# Altium PCB ZYNQ_BOARD.PcbDoc (part 1 of 9)
Units mm, origin at the board's own origin, x right, y up, seen from the top; angles counter-clockwise.
Board outline 120 x 66 mm, 10 copper layers (Top Layer, Internal Plane 1 (GND), Middle Layer 1, Middle Layer 2, Internal Plane 2 (+1.0V), Middle Layer 3, Middle Layer 4, Middle Layer 5 (PWR), Internal Plane 3 (GND), Bottom Layer), stack 0.982 mm thick; 333 components, 331 nets, 1511 pads, 1077 vias.
Unrouted connection lines stored in the file: 30.
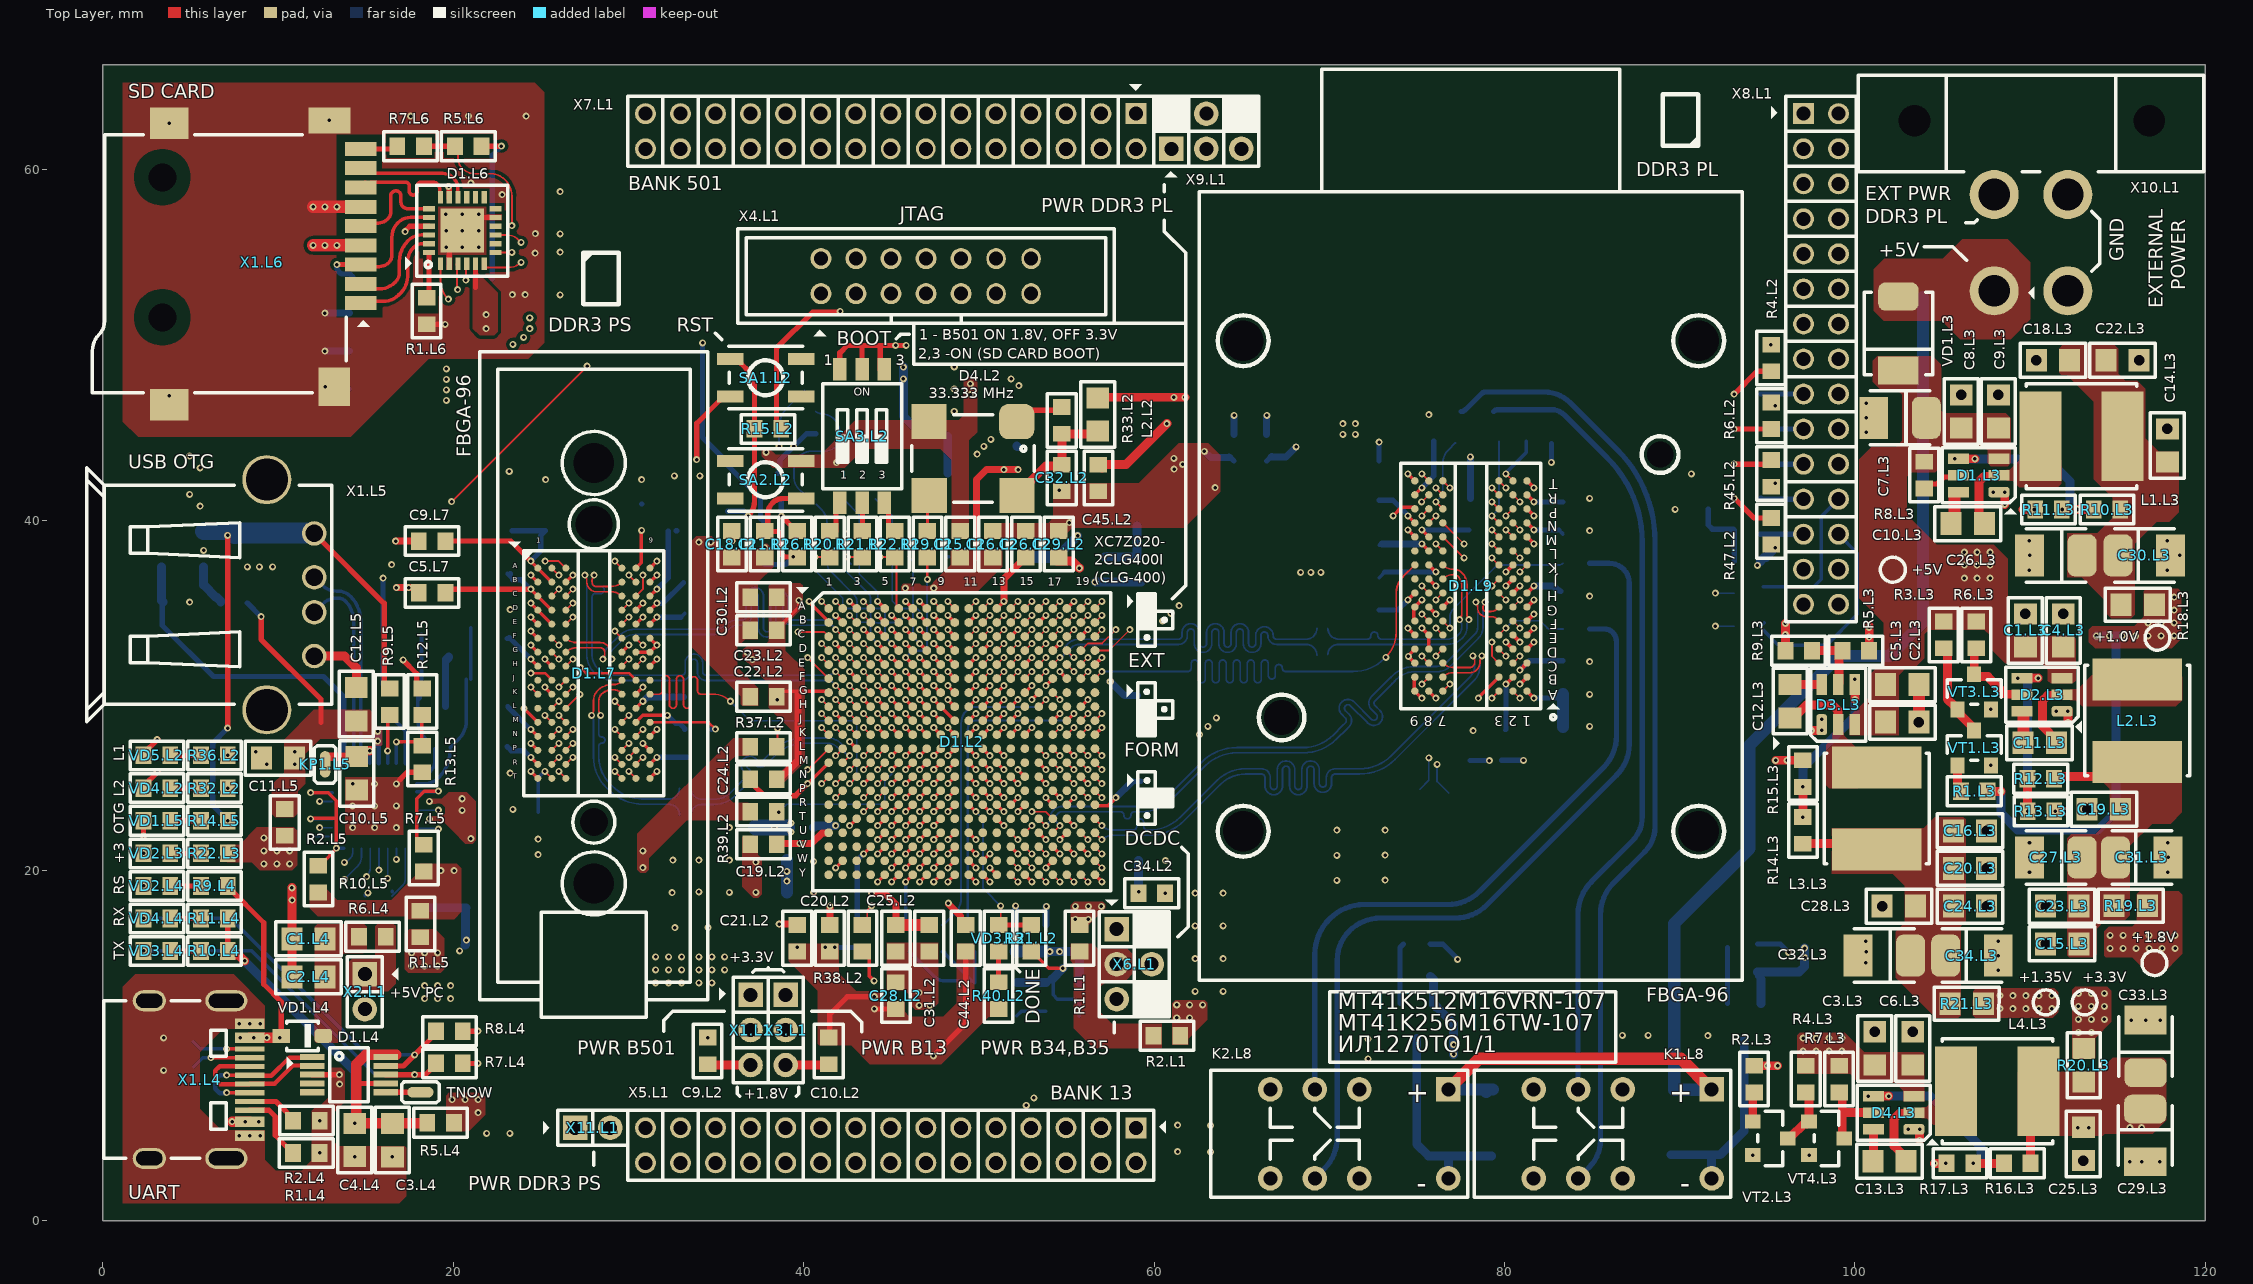
[diagram p0: Top Layer view]
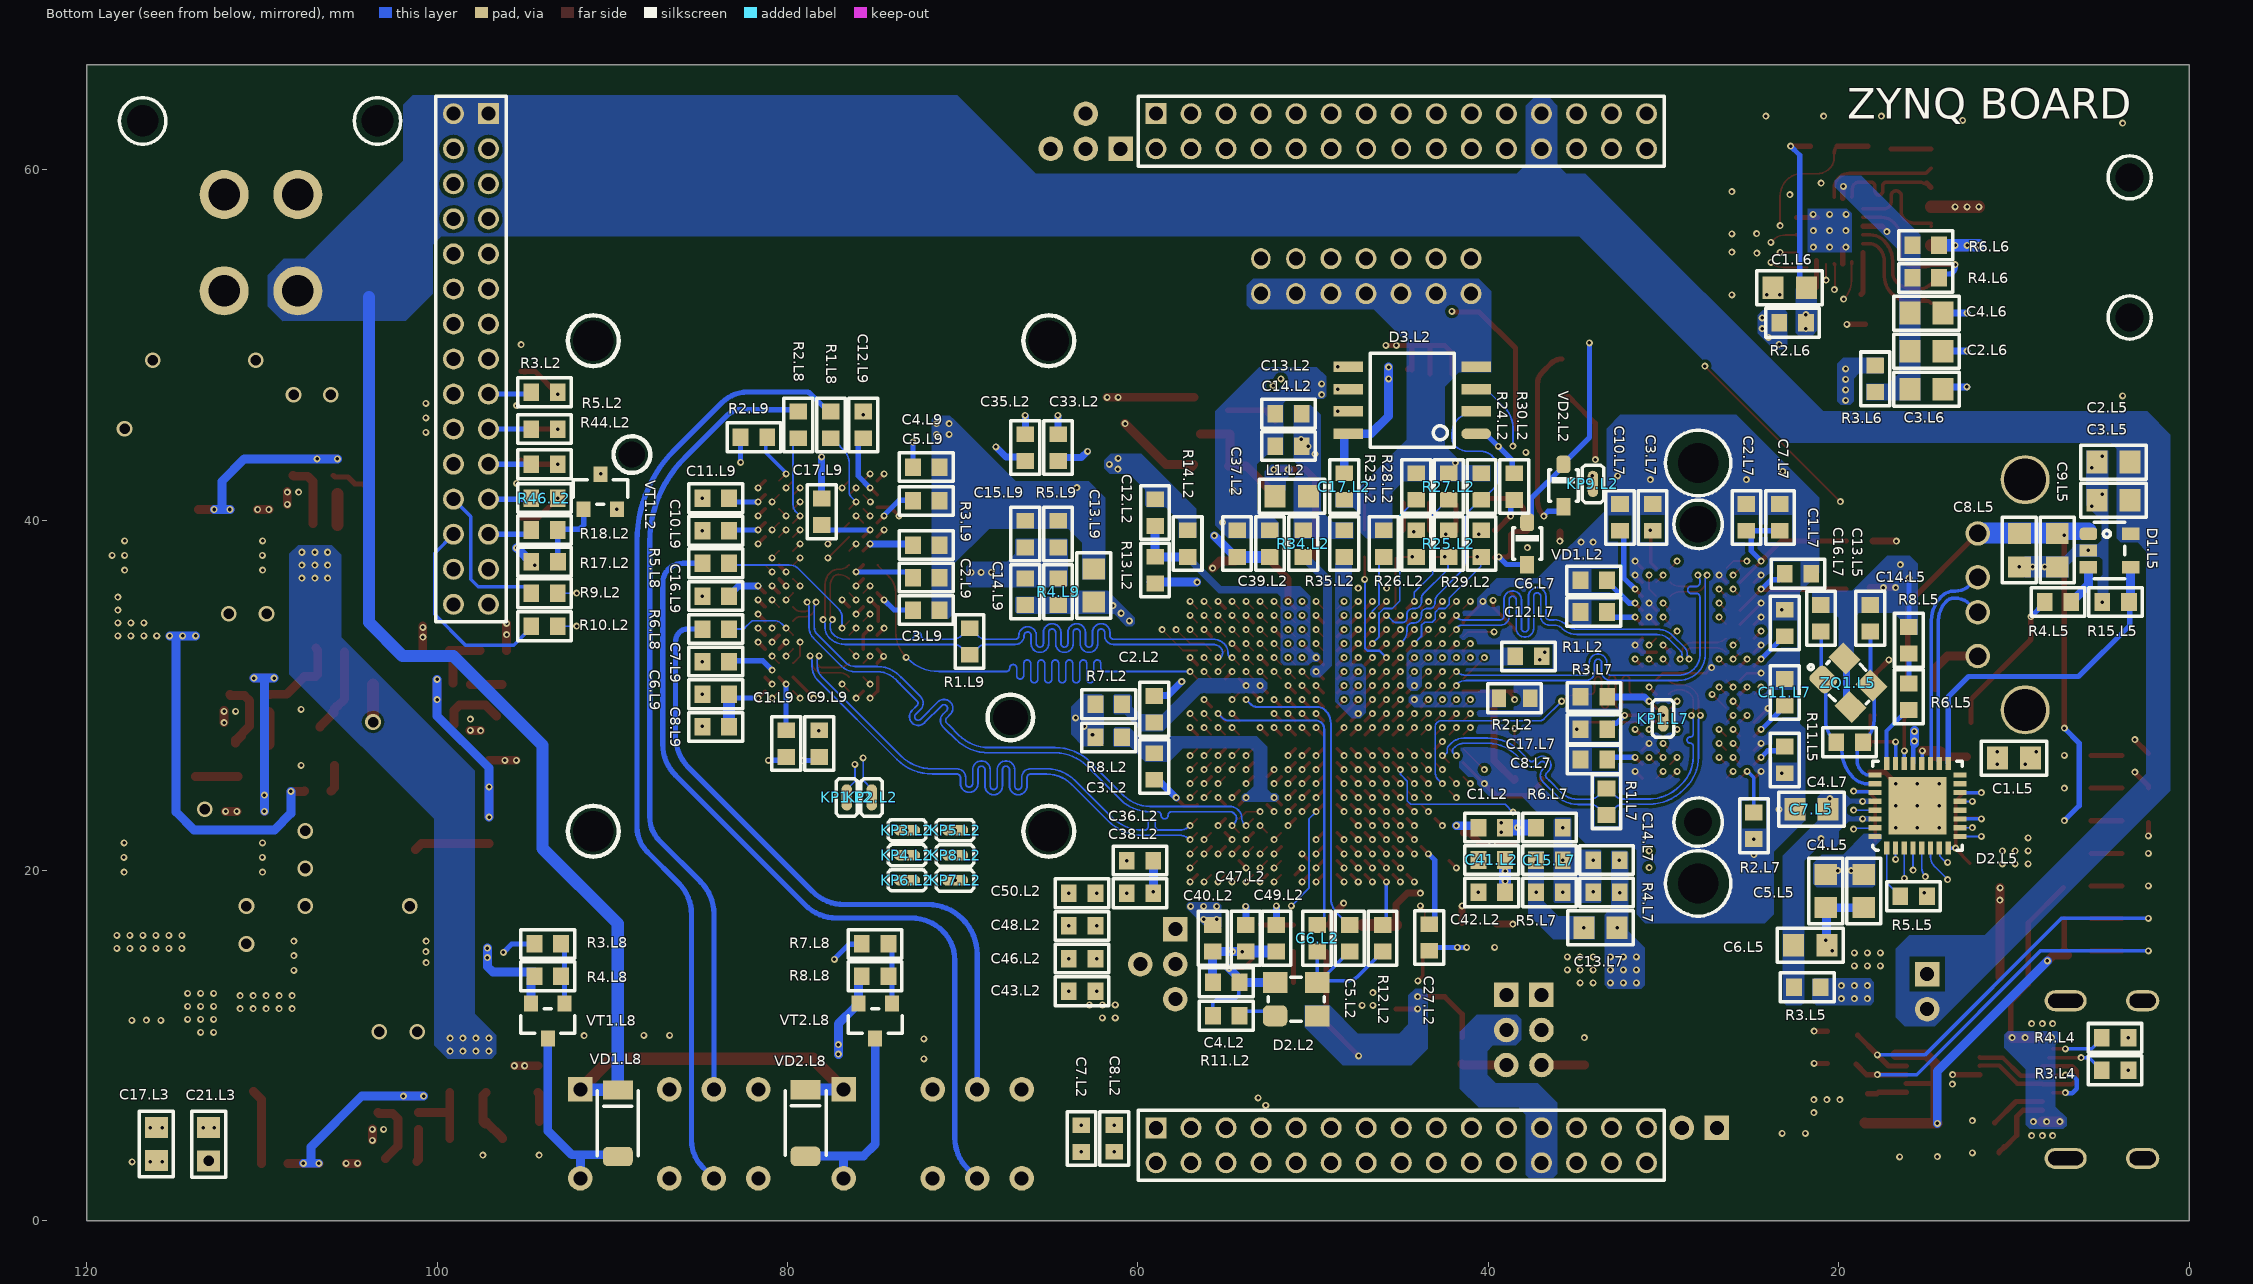
[diagram p1: Bottom Layer view, seen from below]
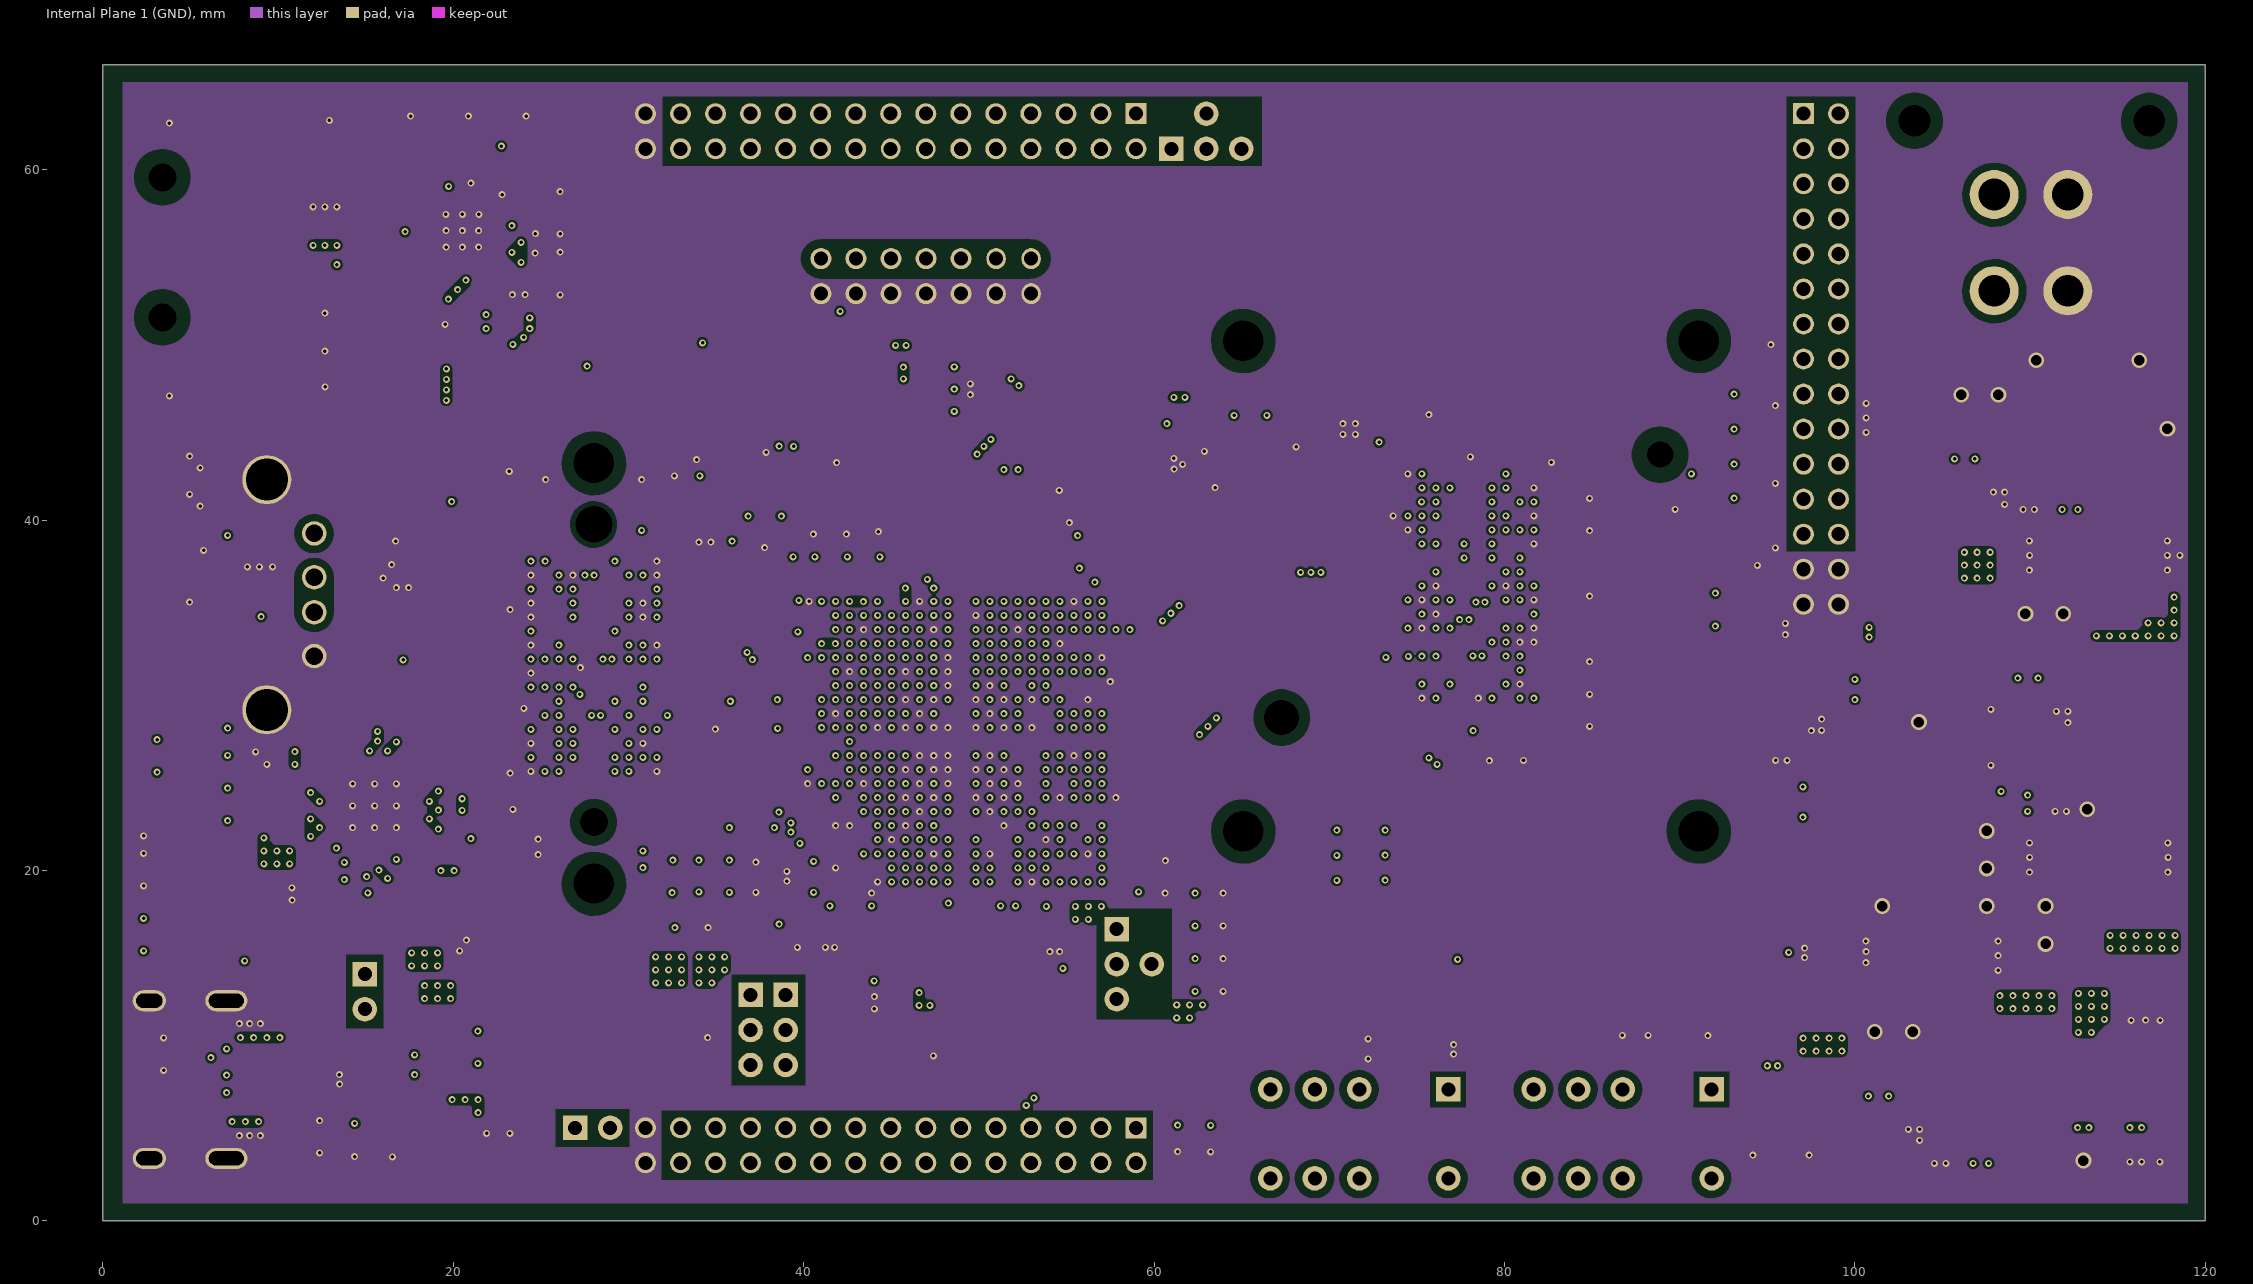
[diagram p2: Internal Plane 1 (GND)]
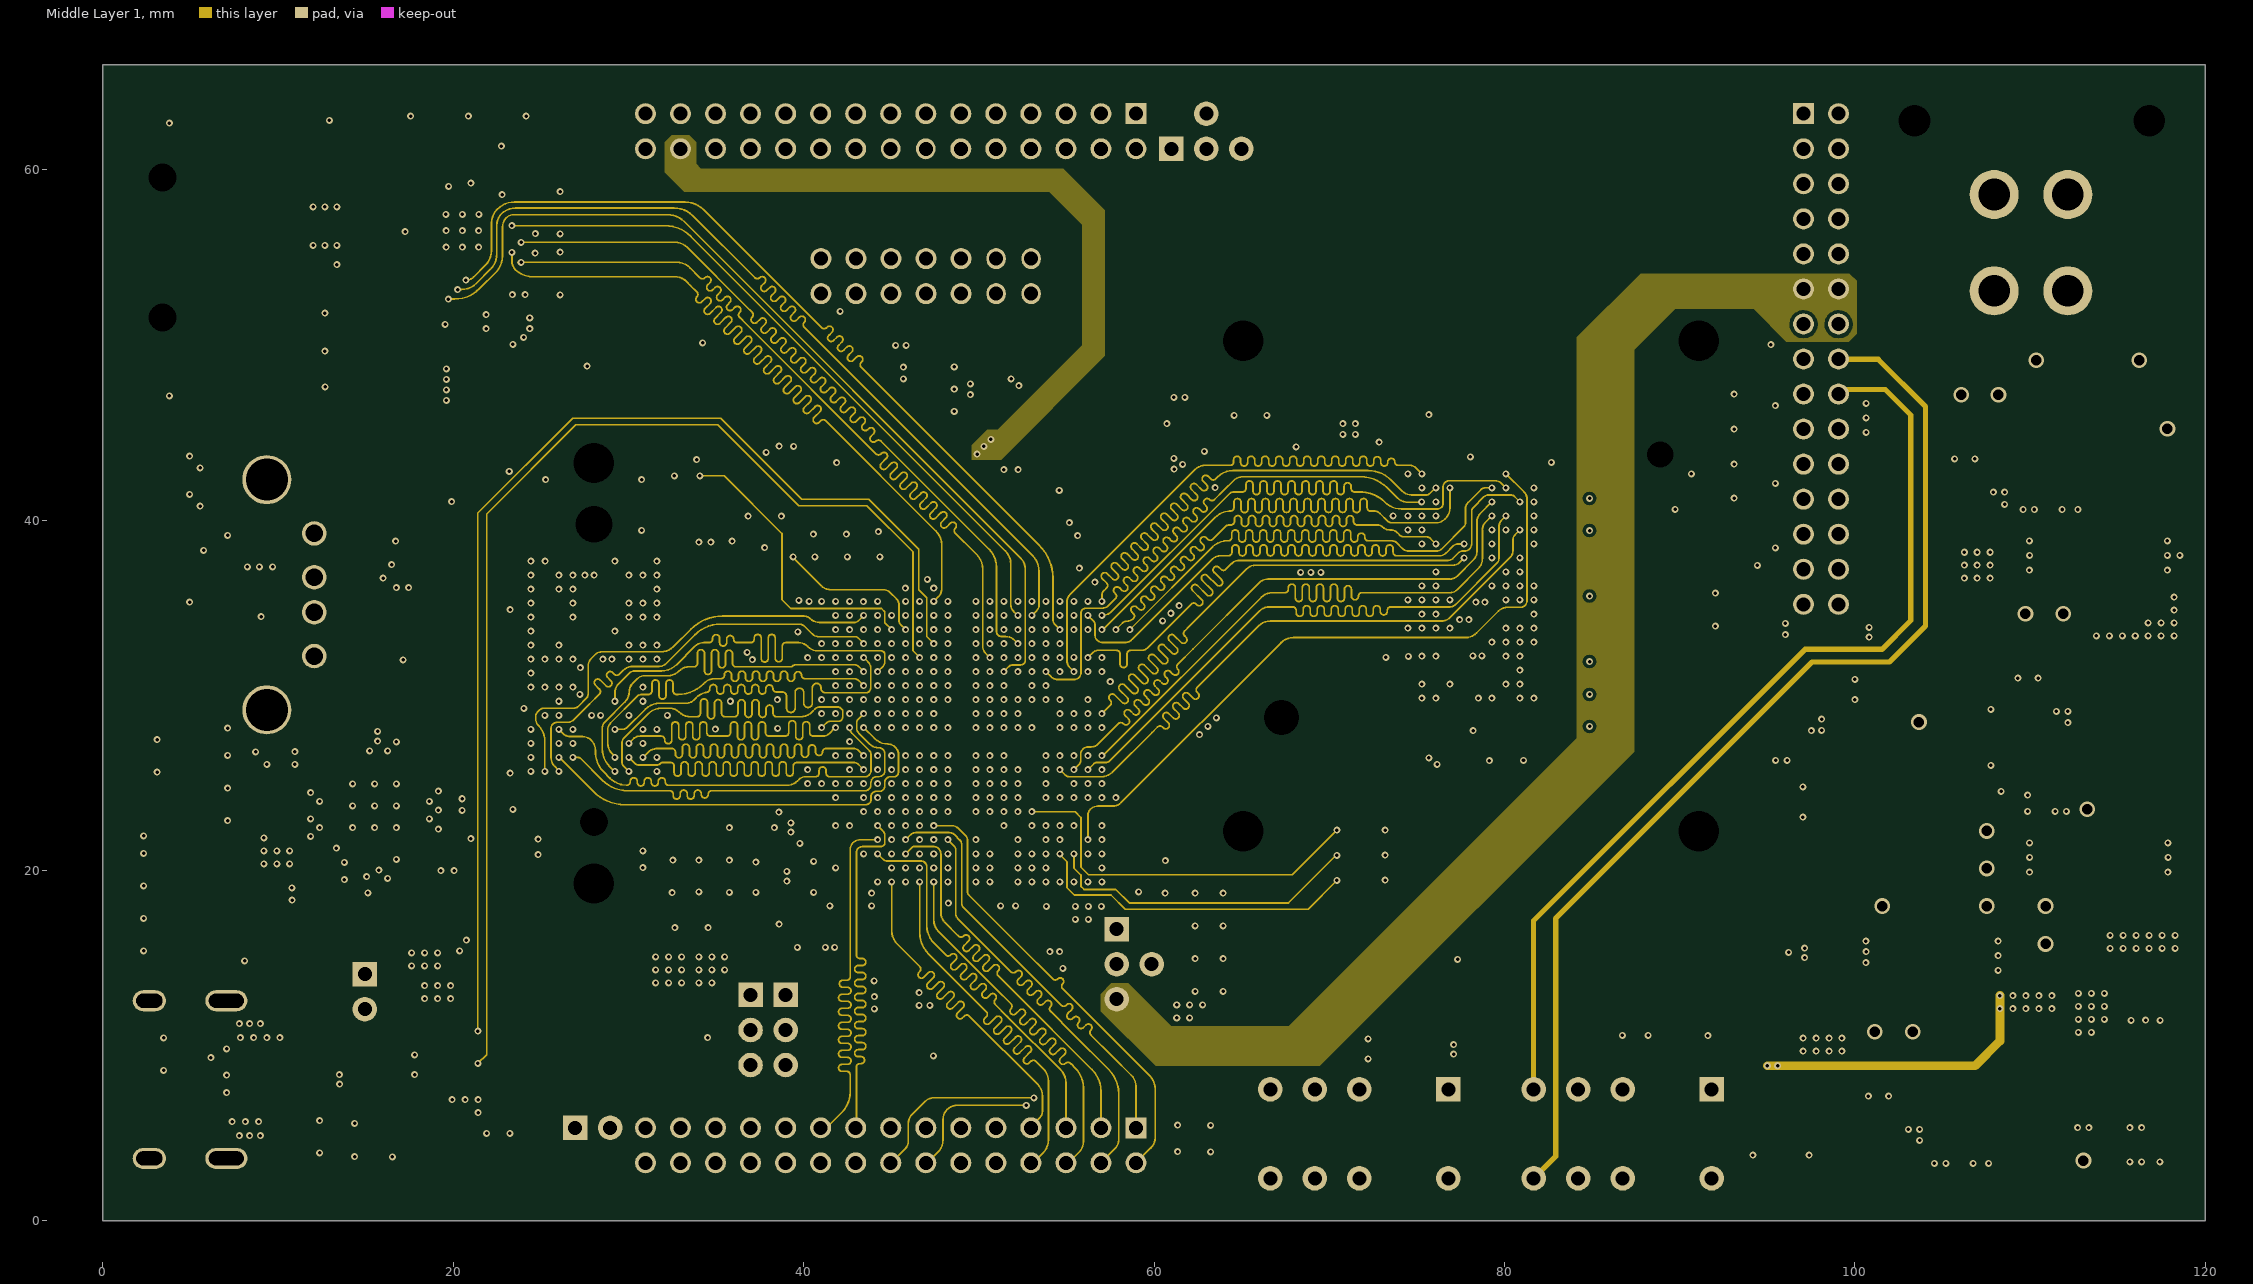
[diagram p3: Middle Layer 1]
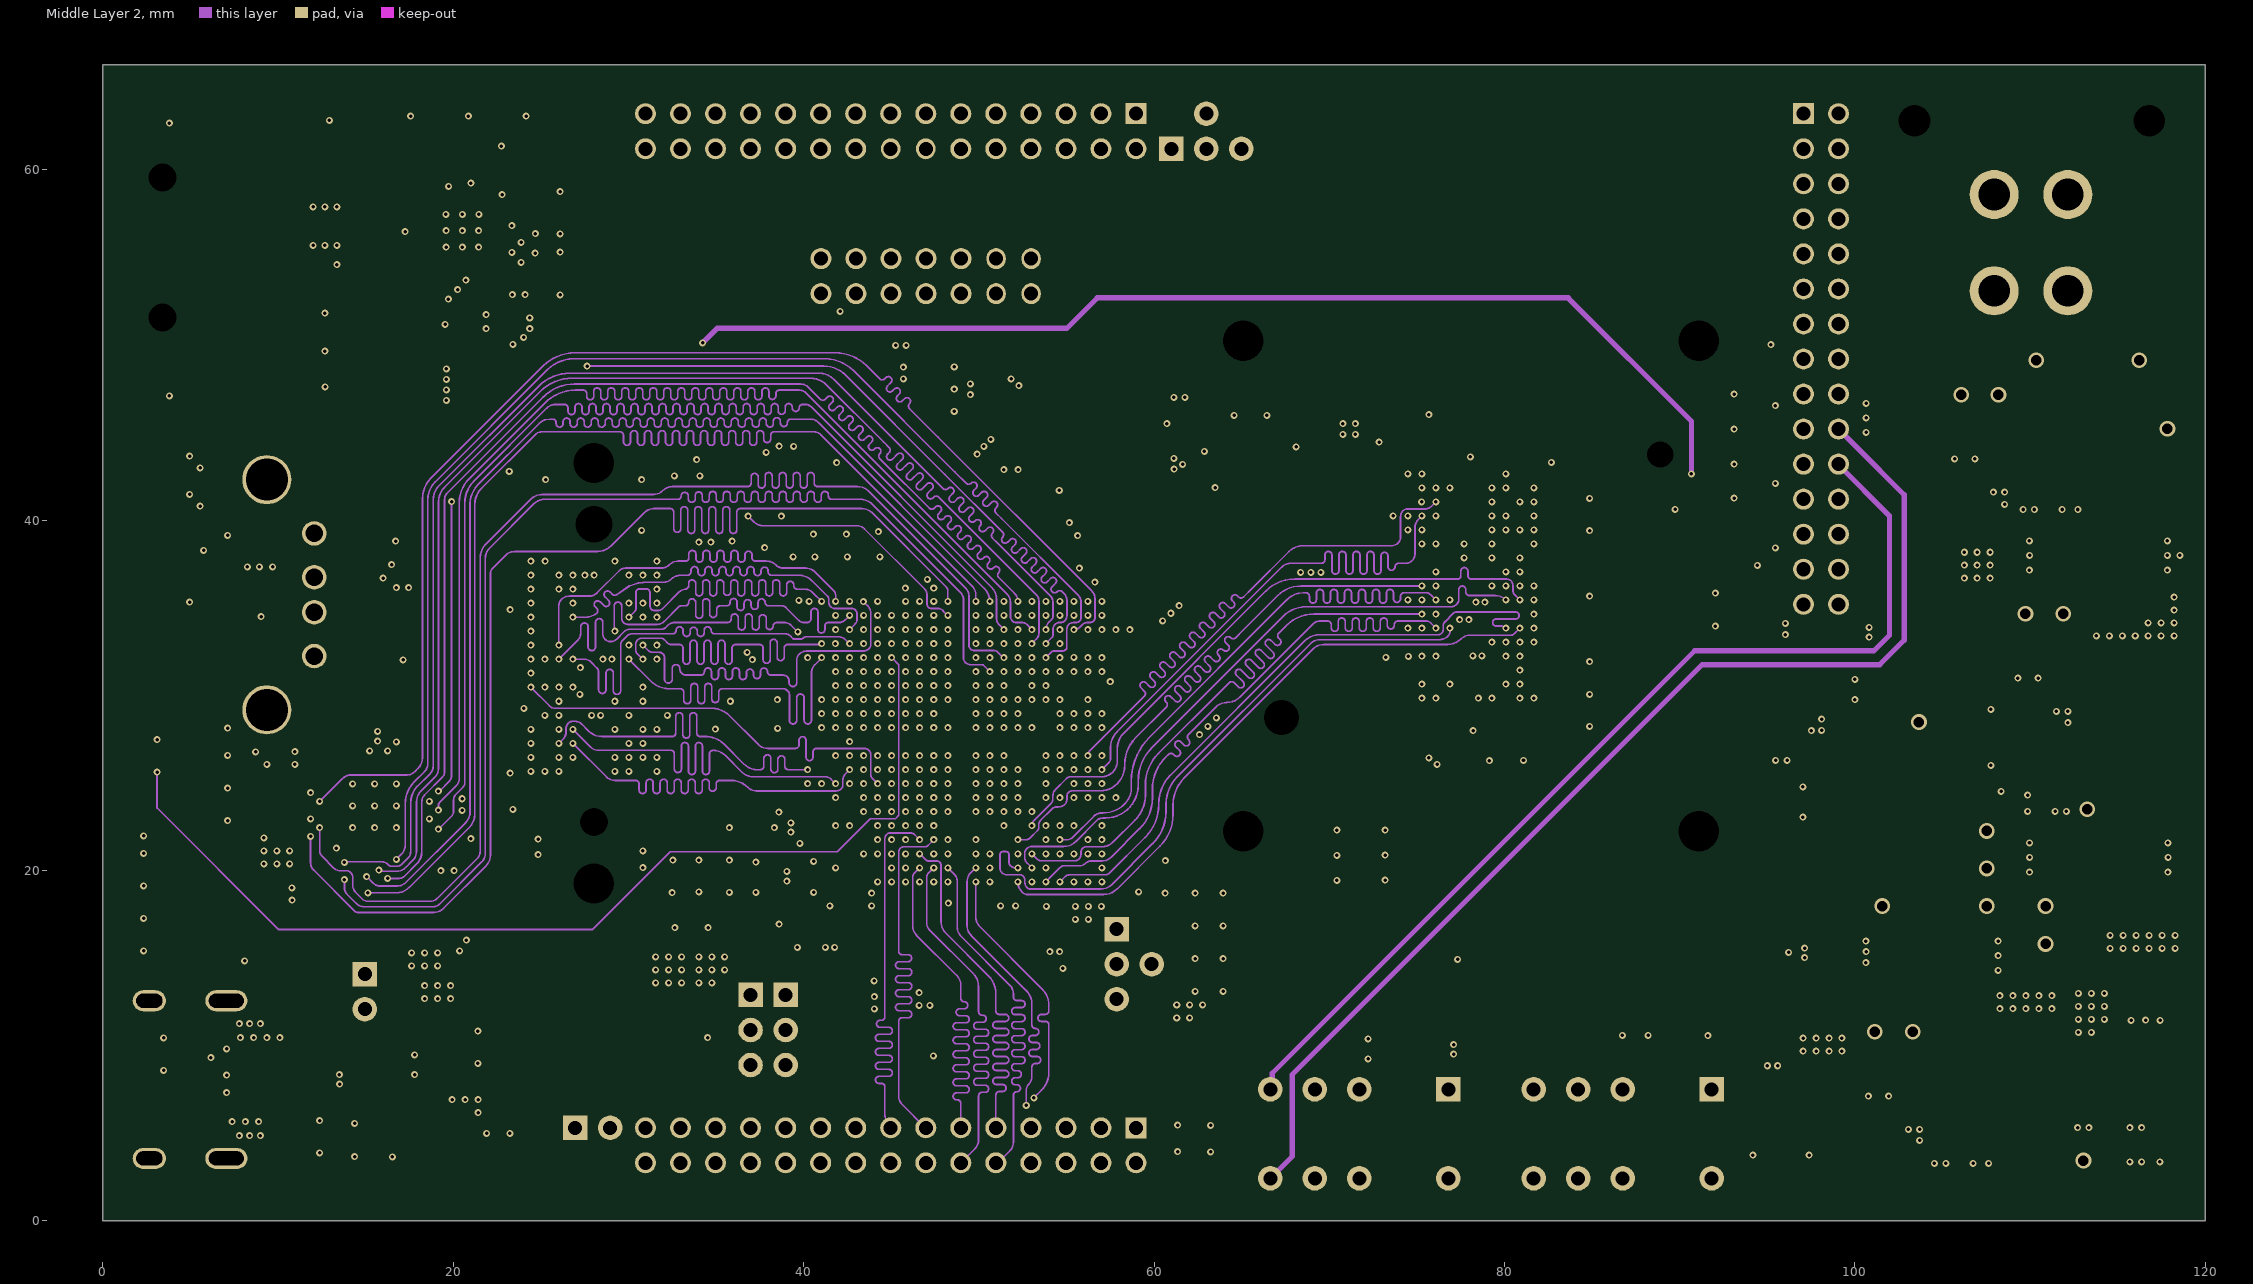
[diagram p4: Middle Layer 2]
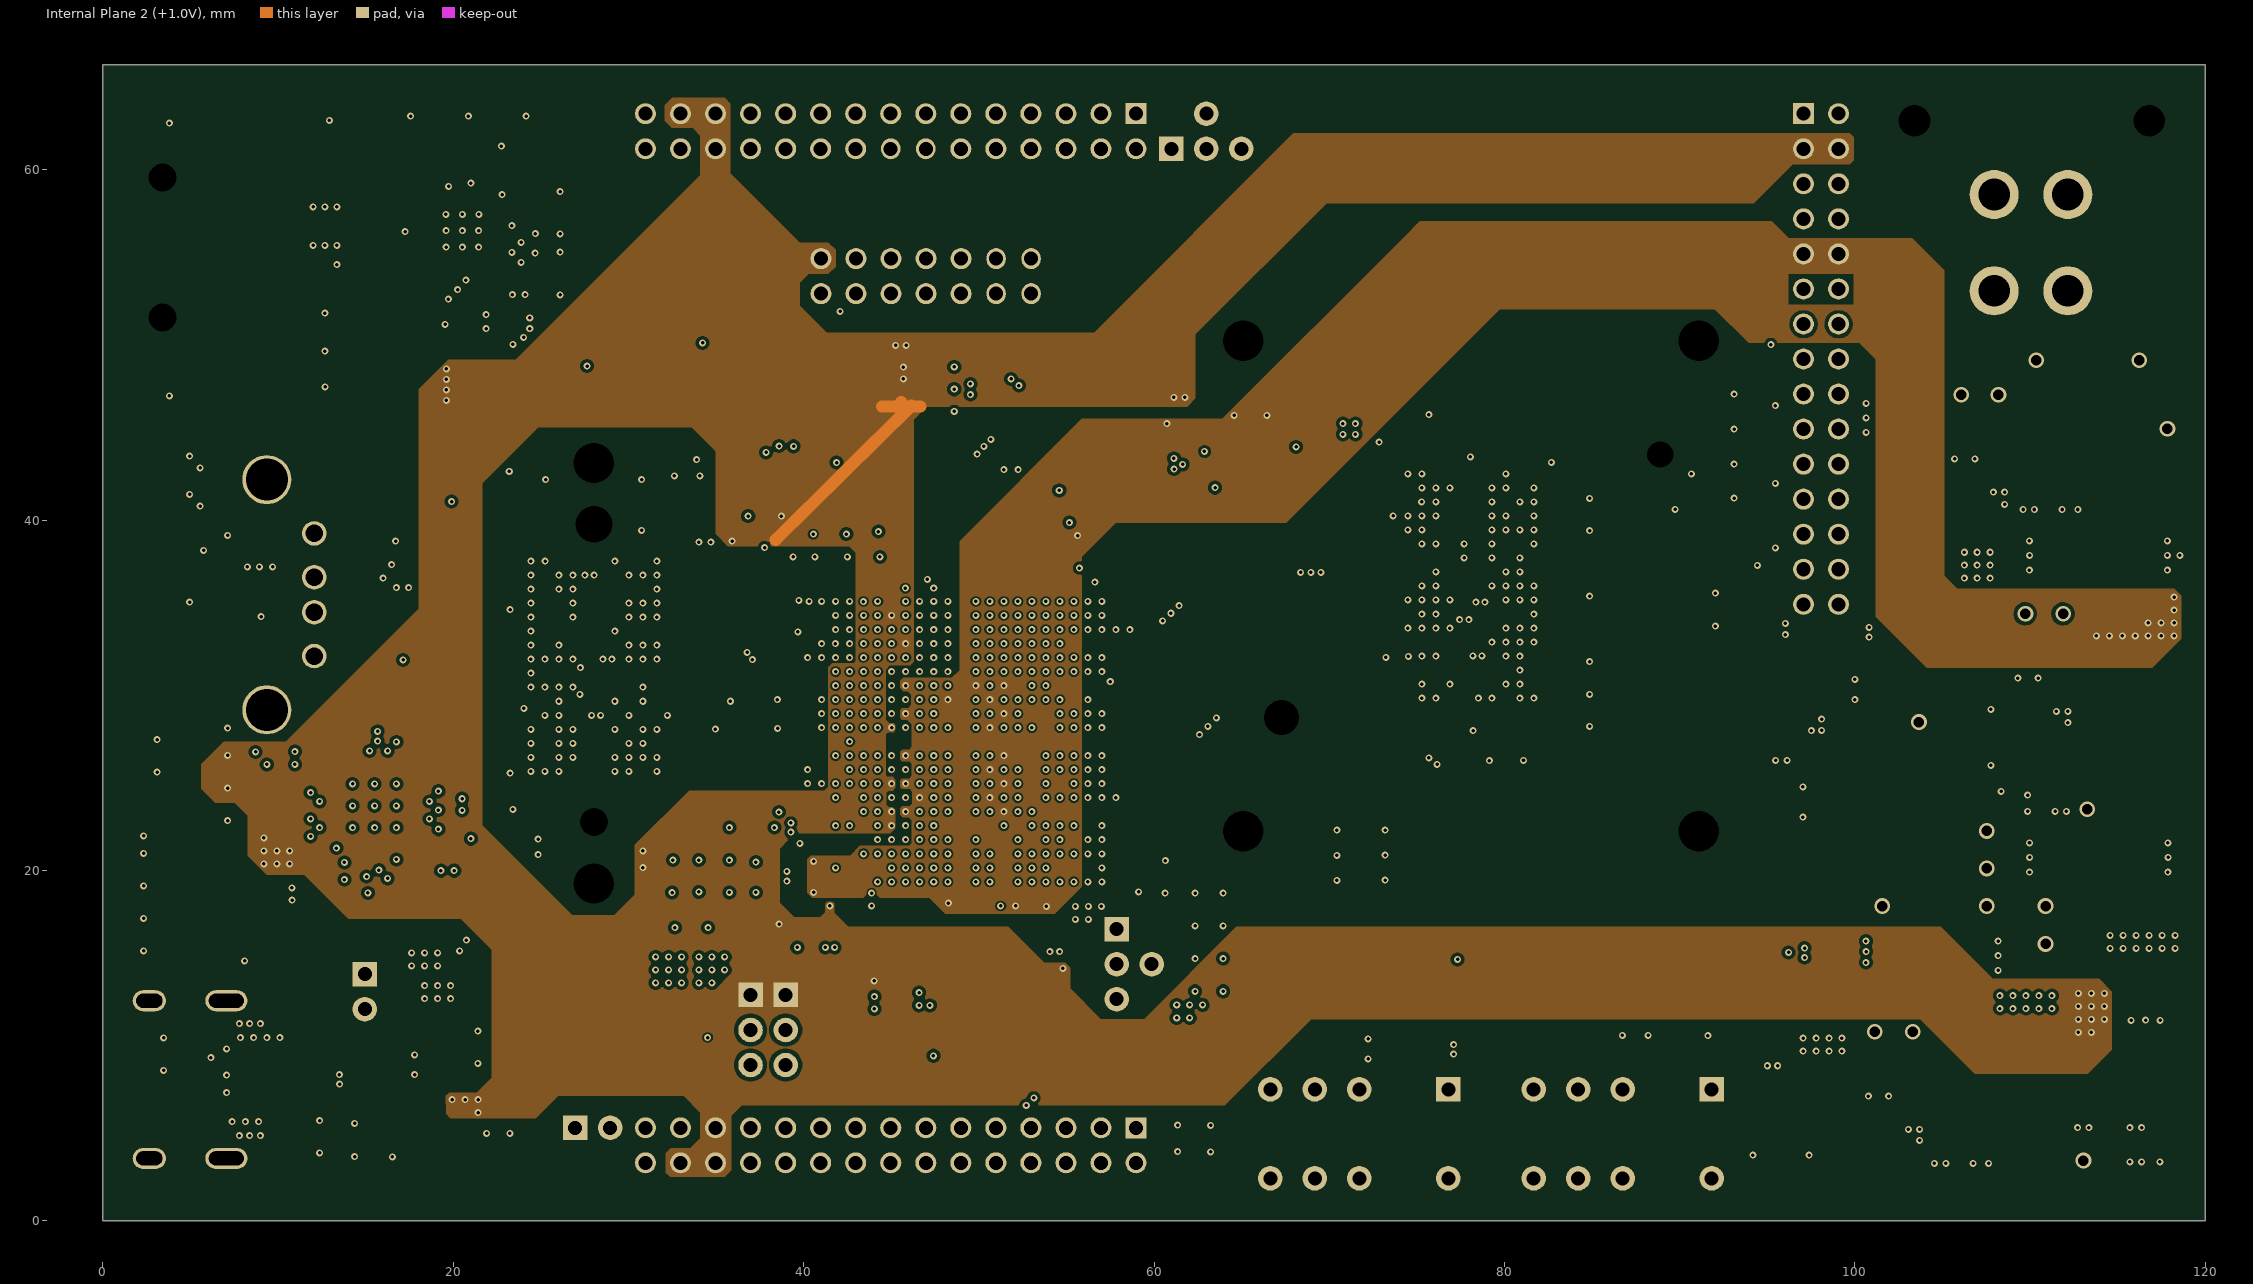
[diagram p5: Internal Plane 2 (+1.0V)]
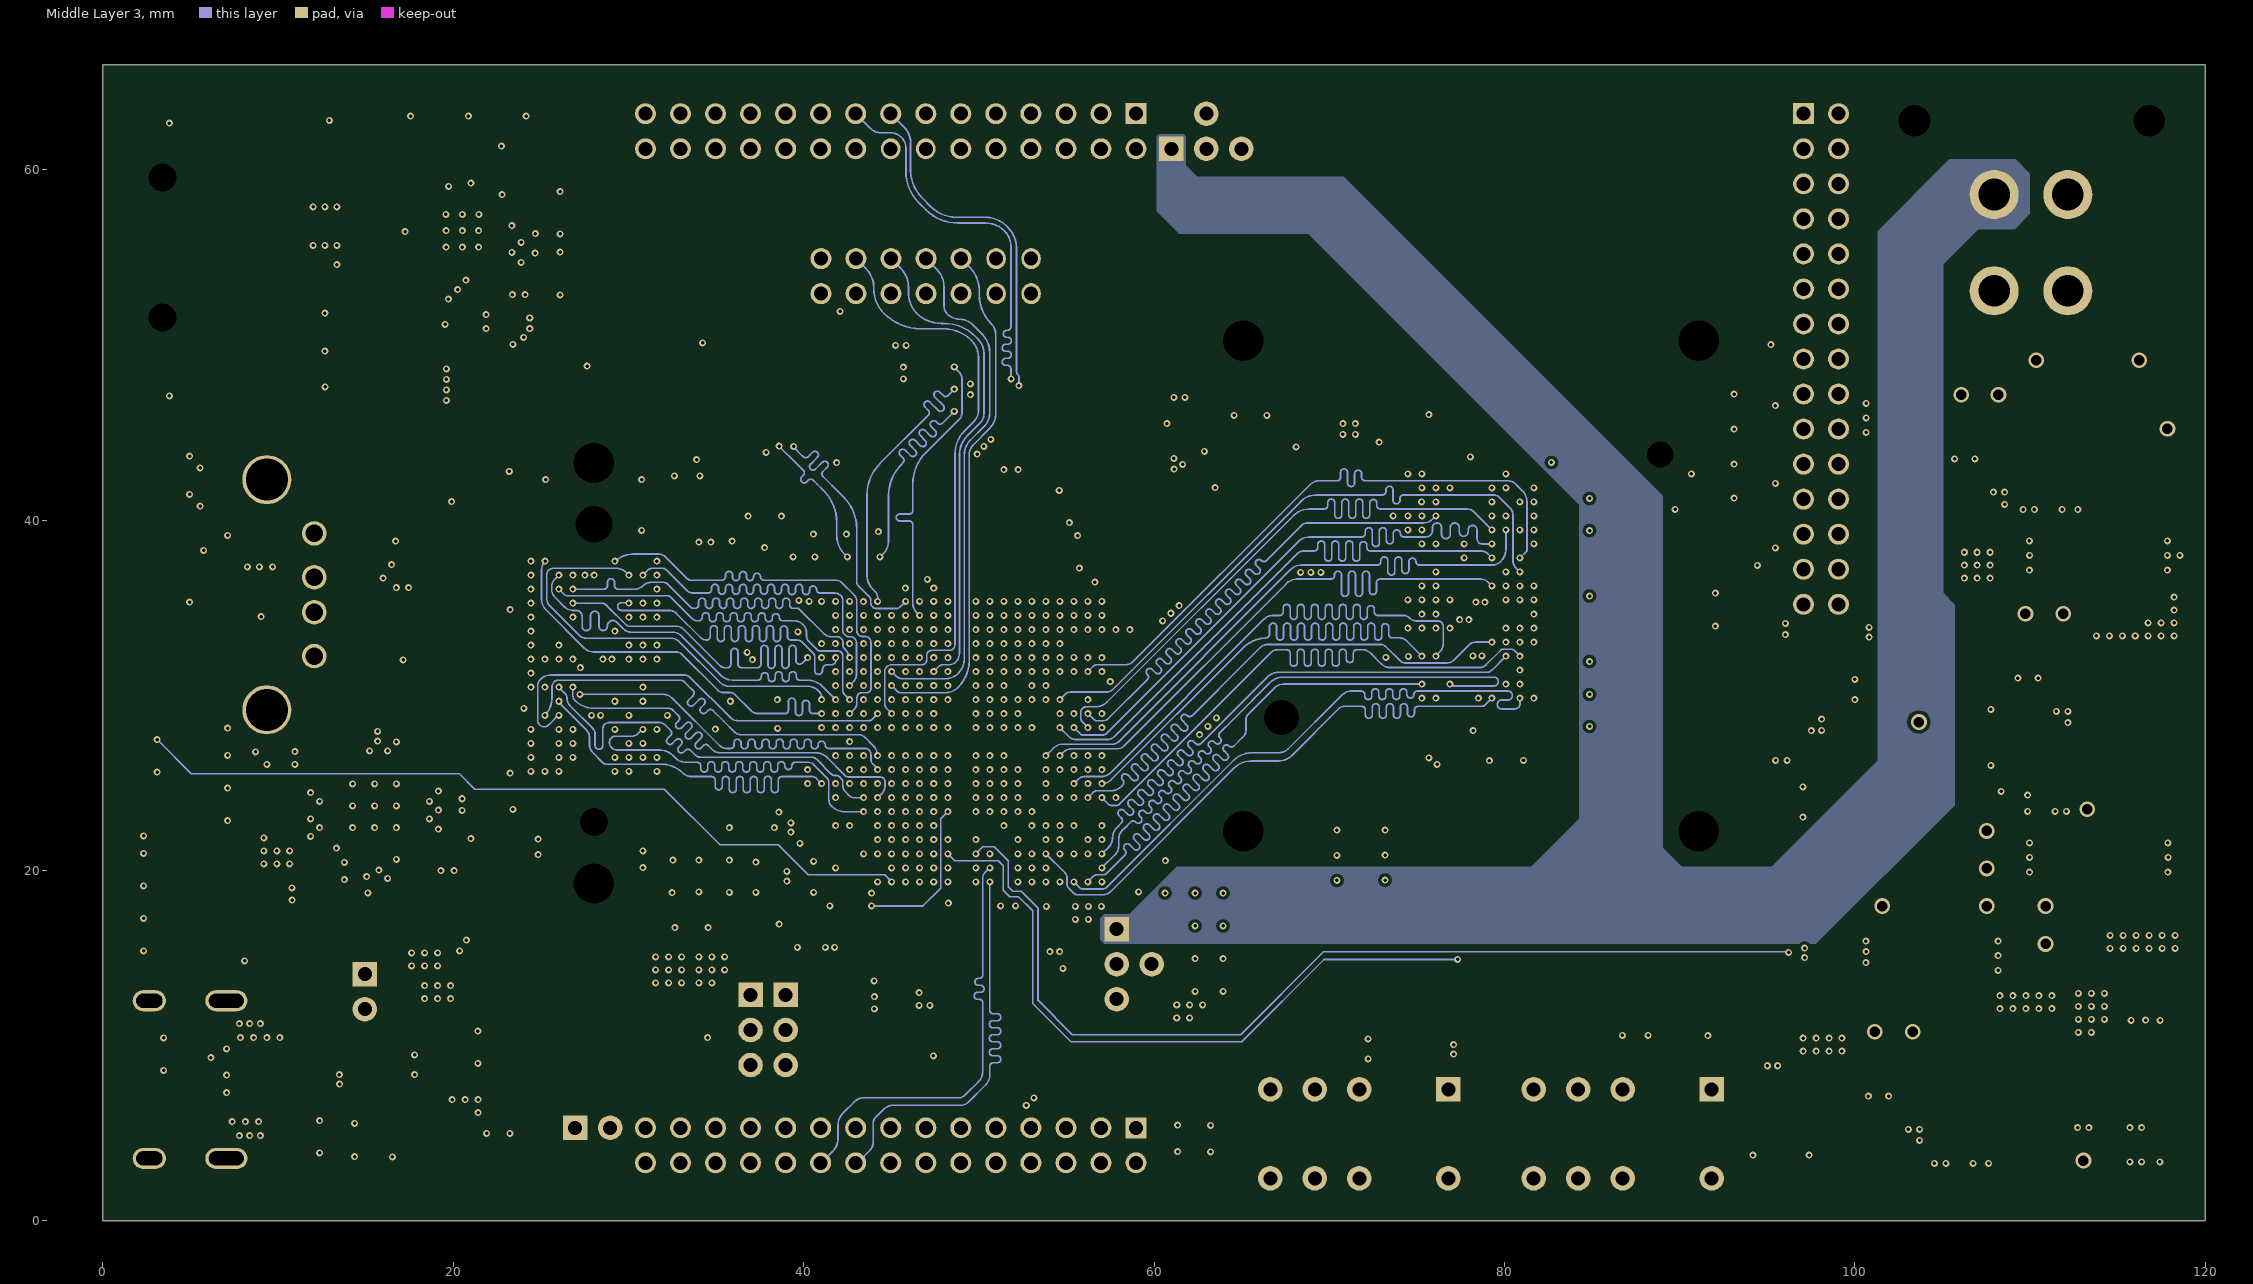
[diagram p6: Middle Layer 3]
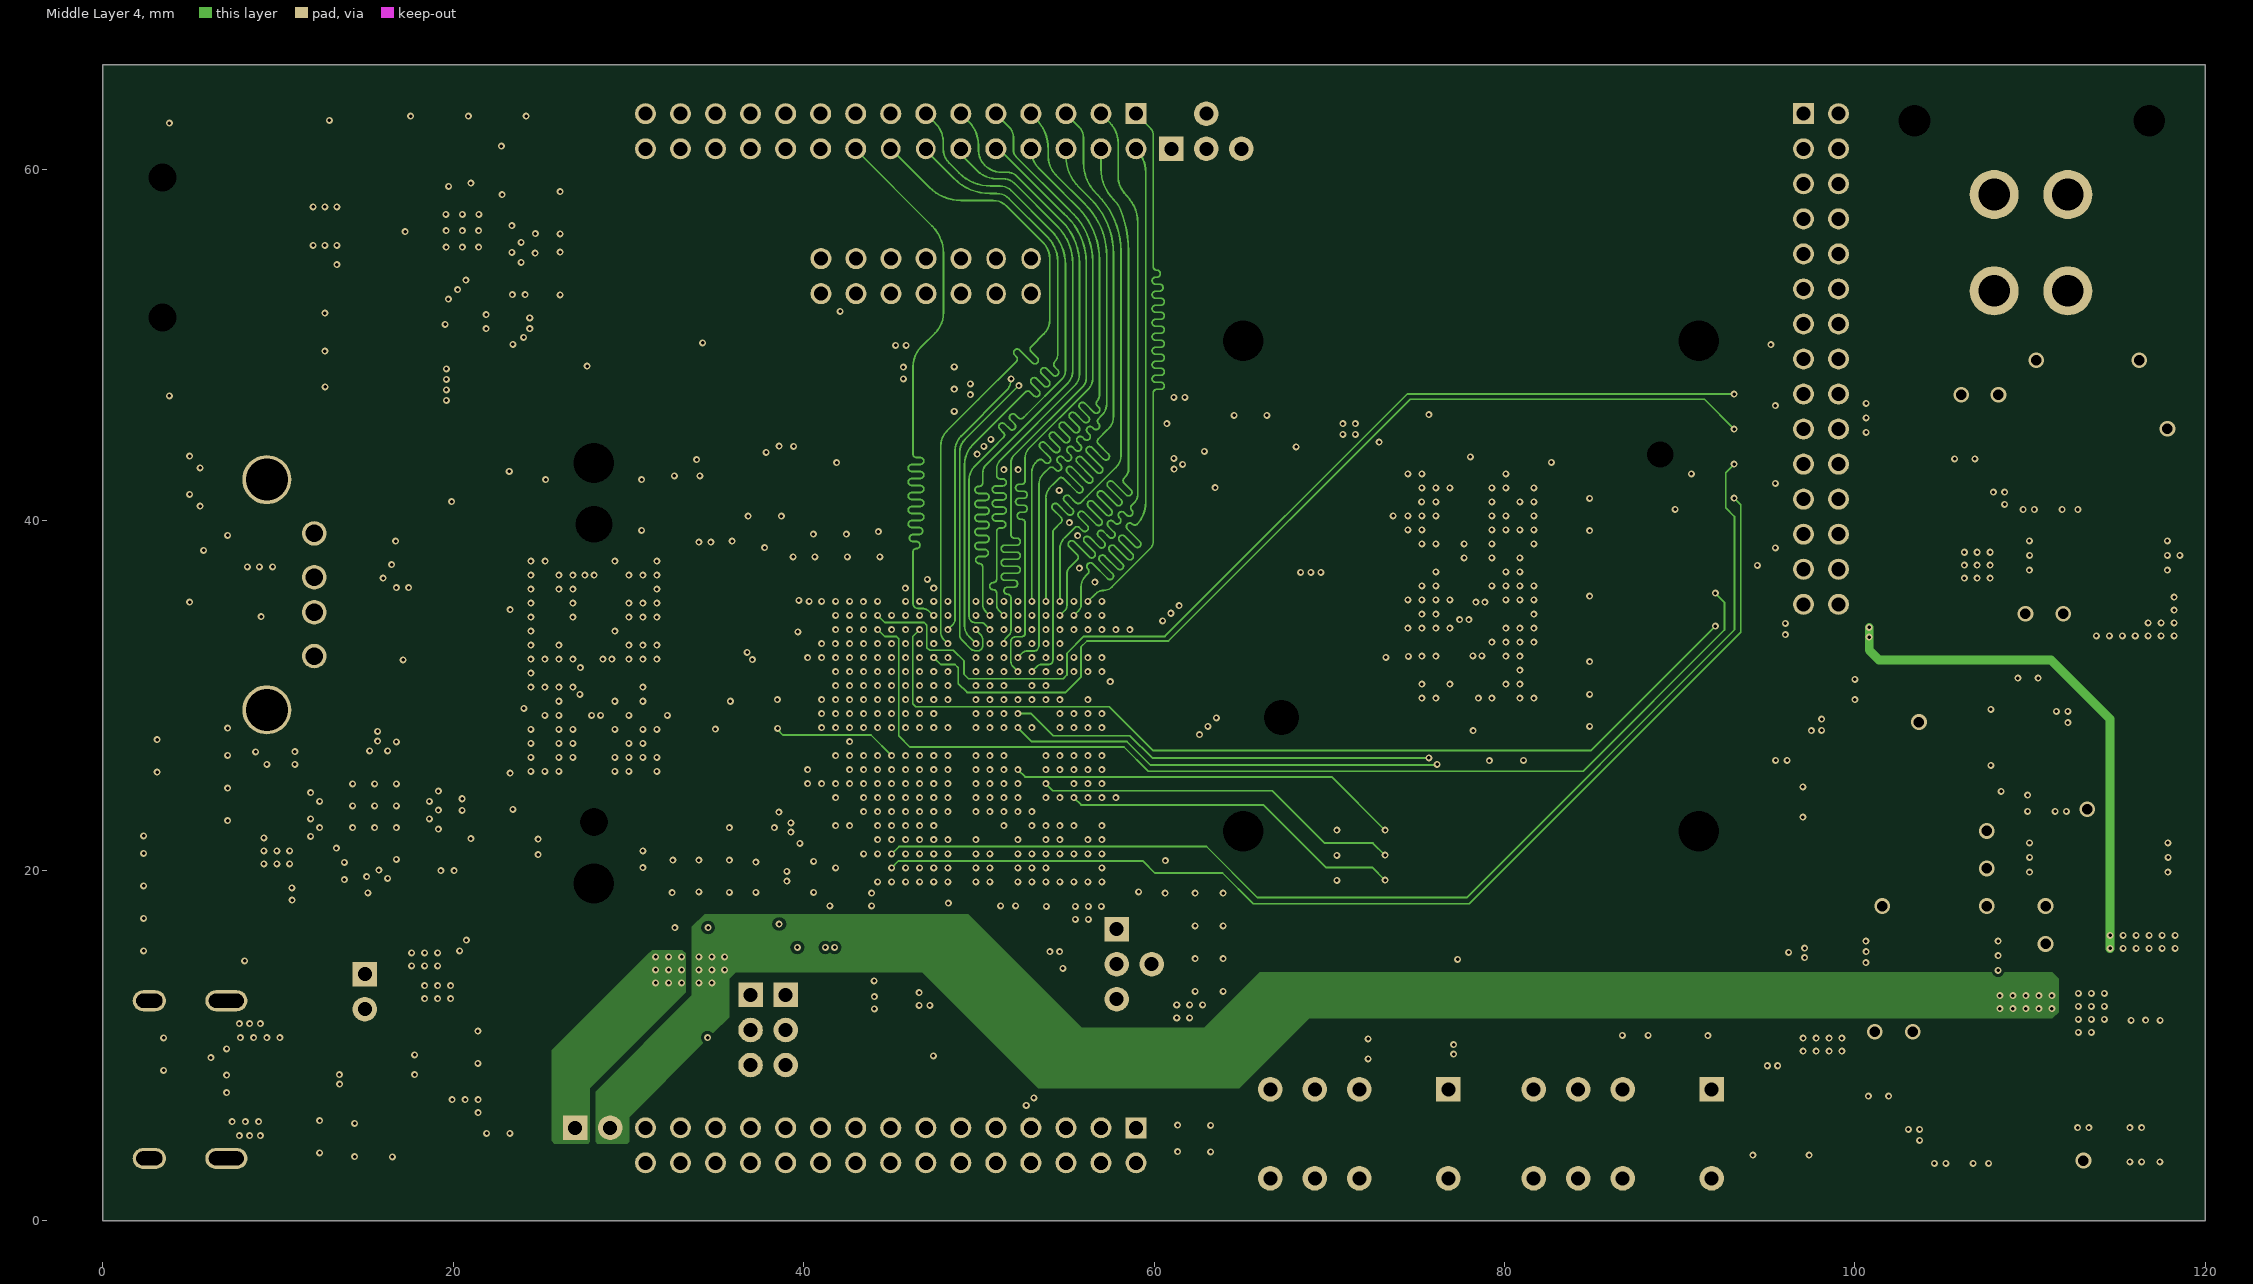
[diagram p7: Middle Layer 4]
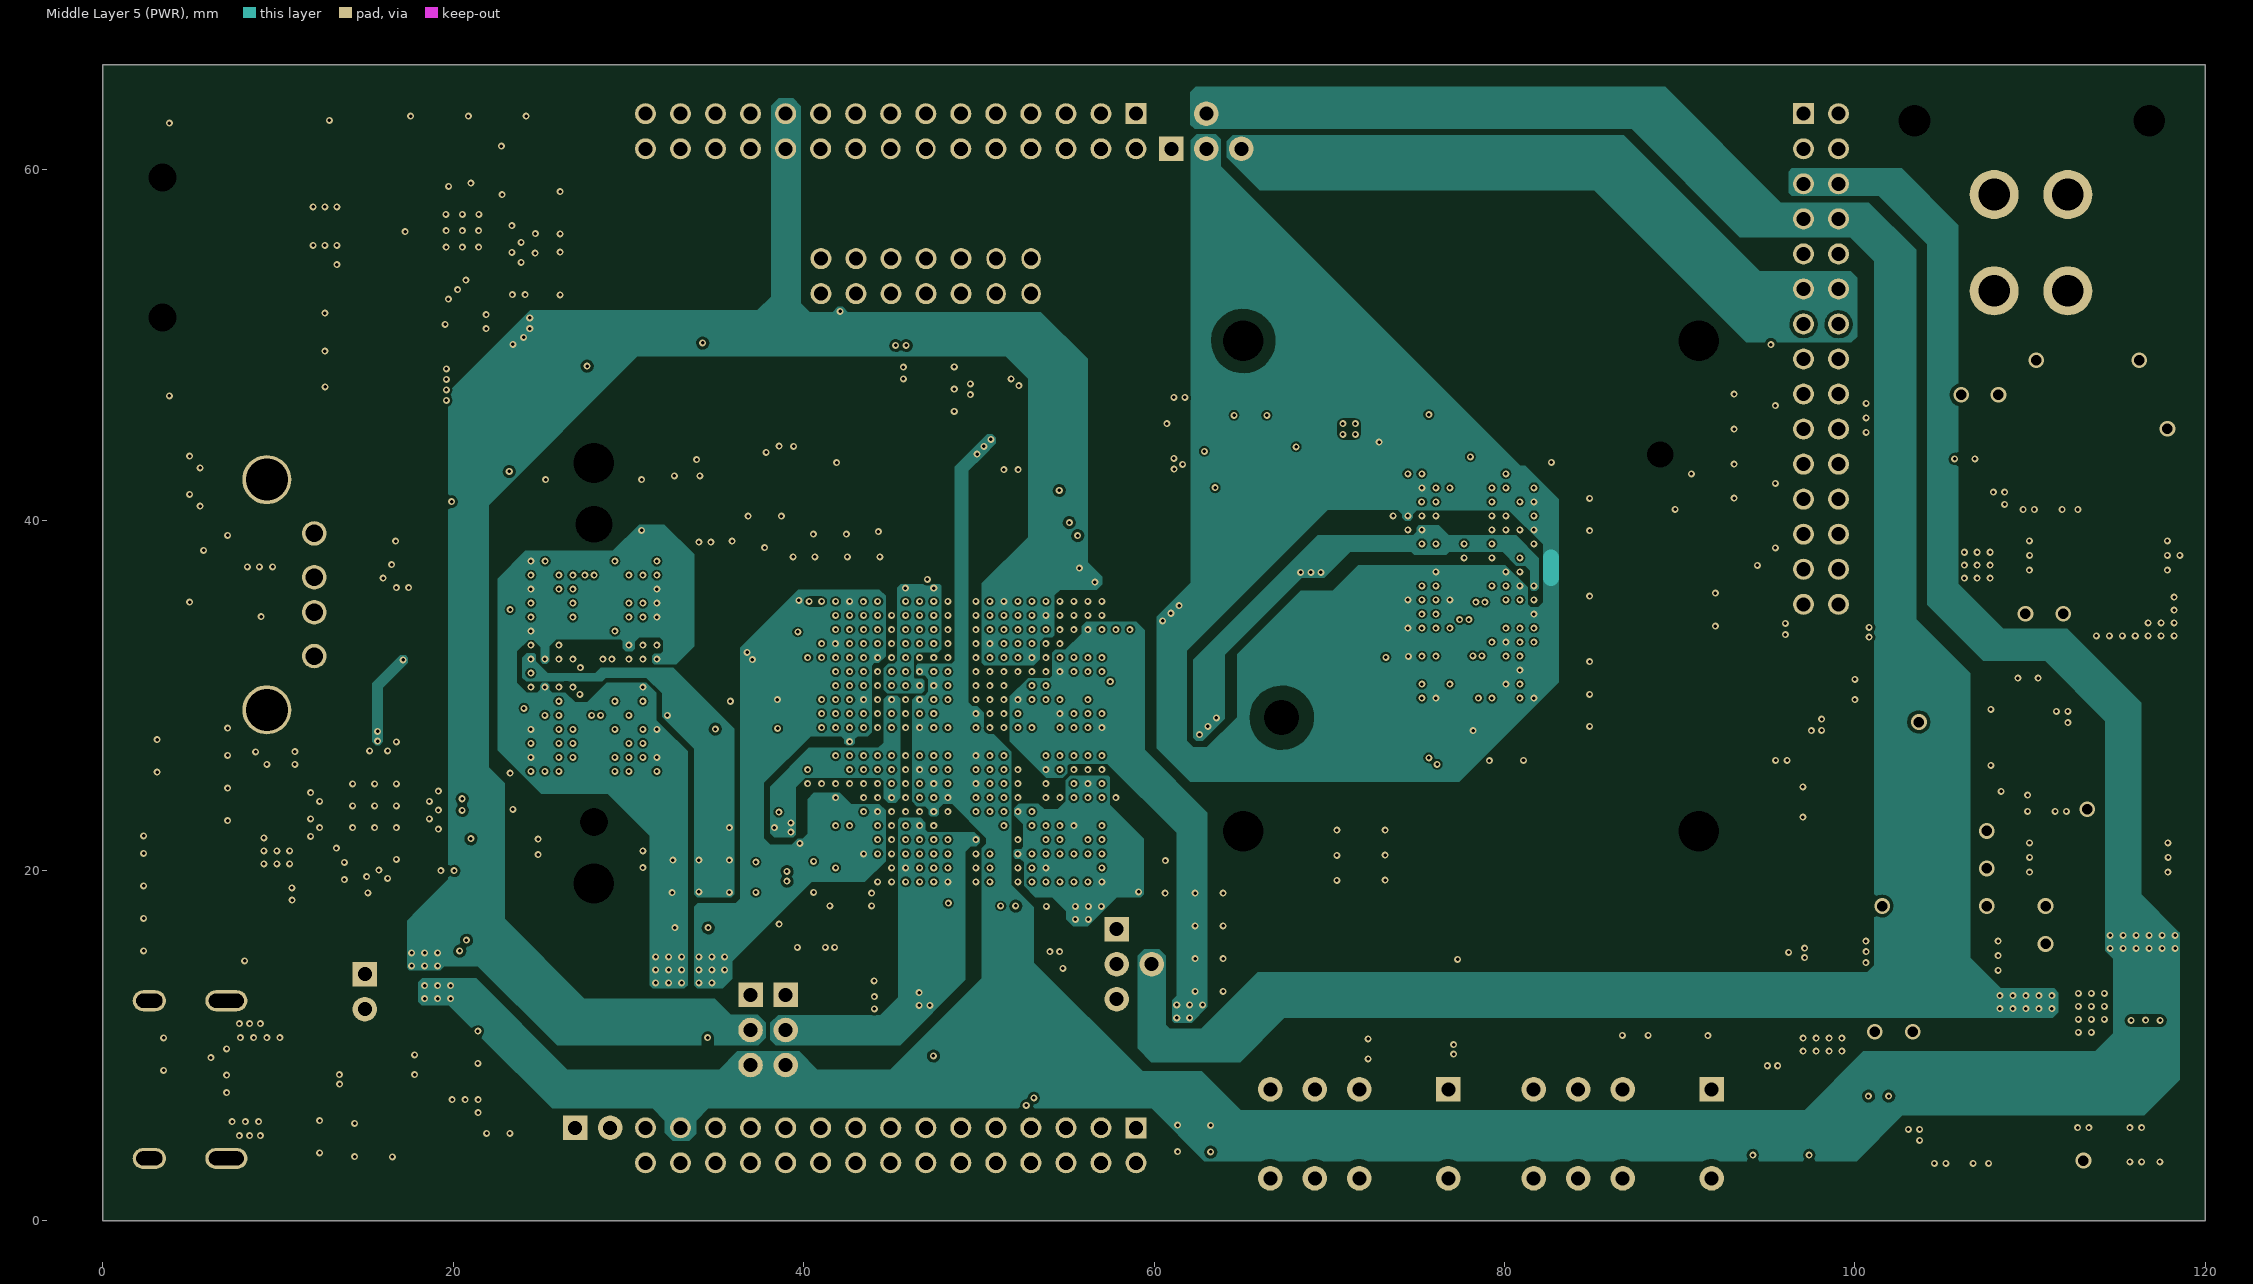
[diagram p8: Middle Layer 5 (PWR)]
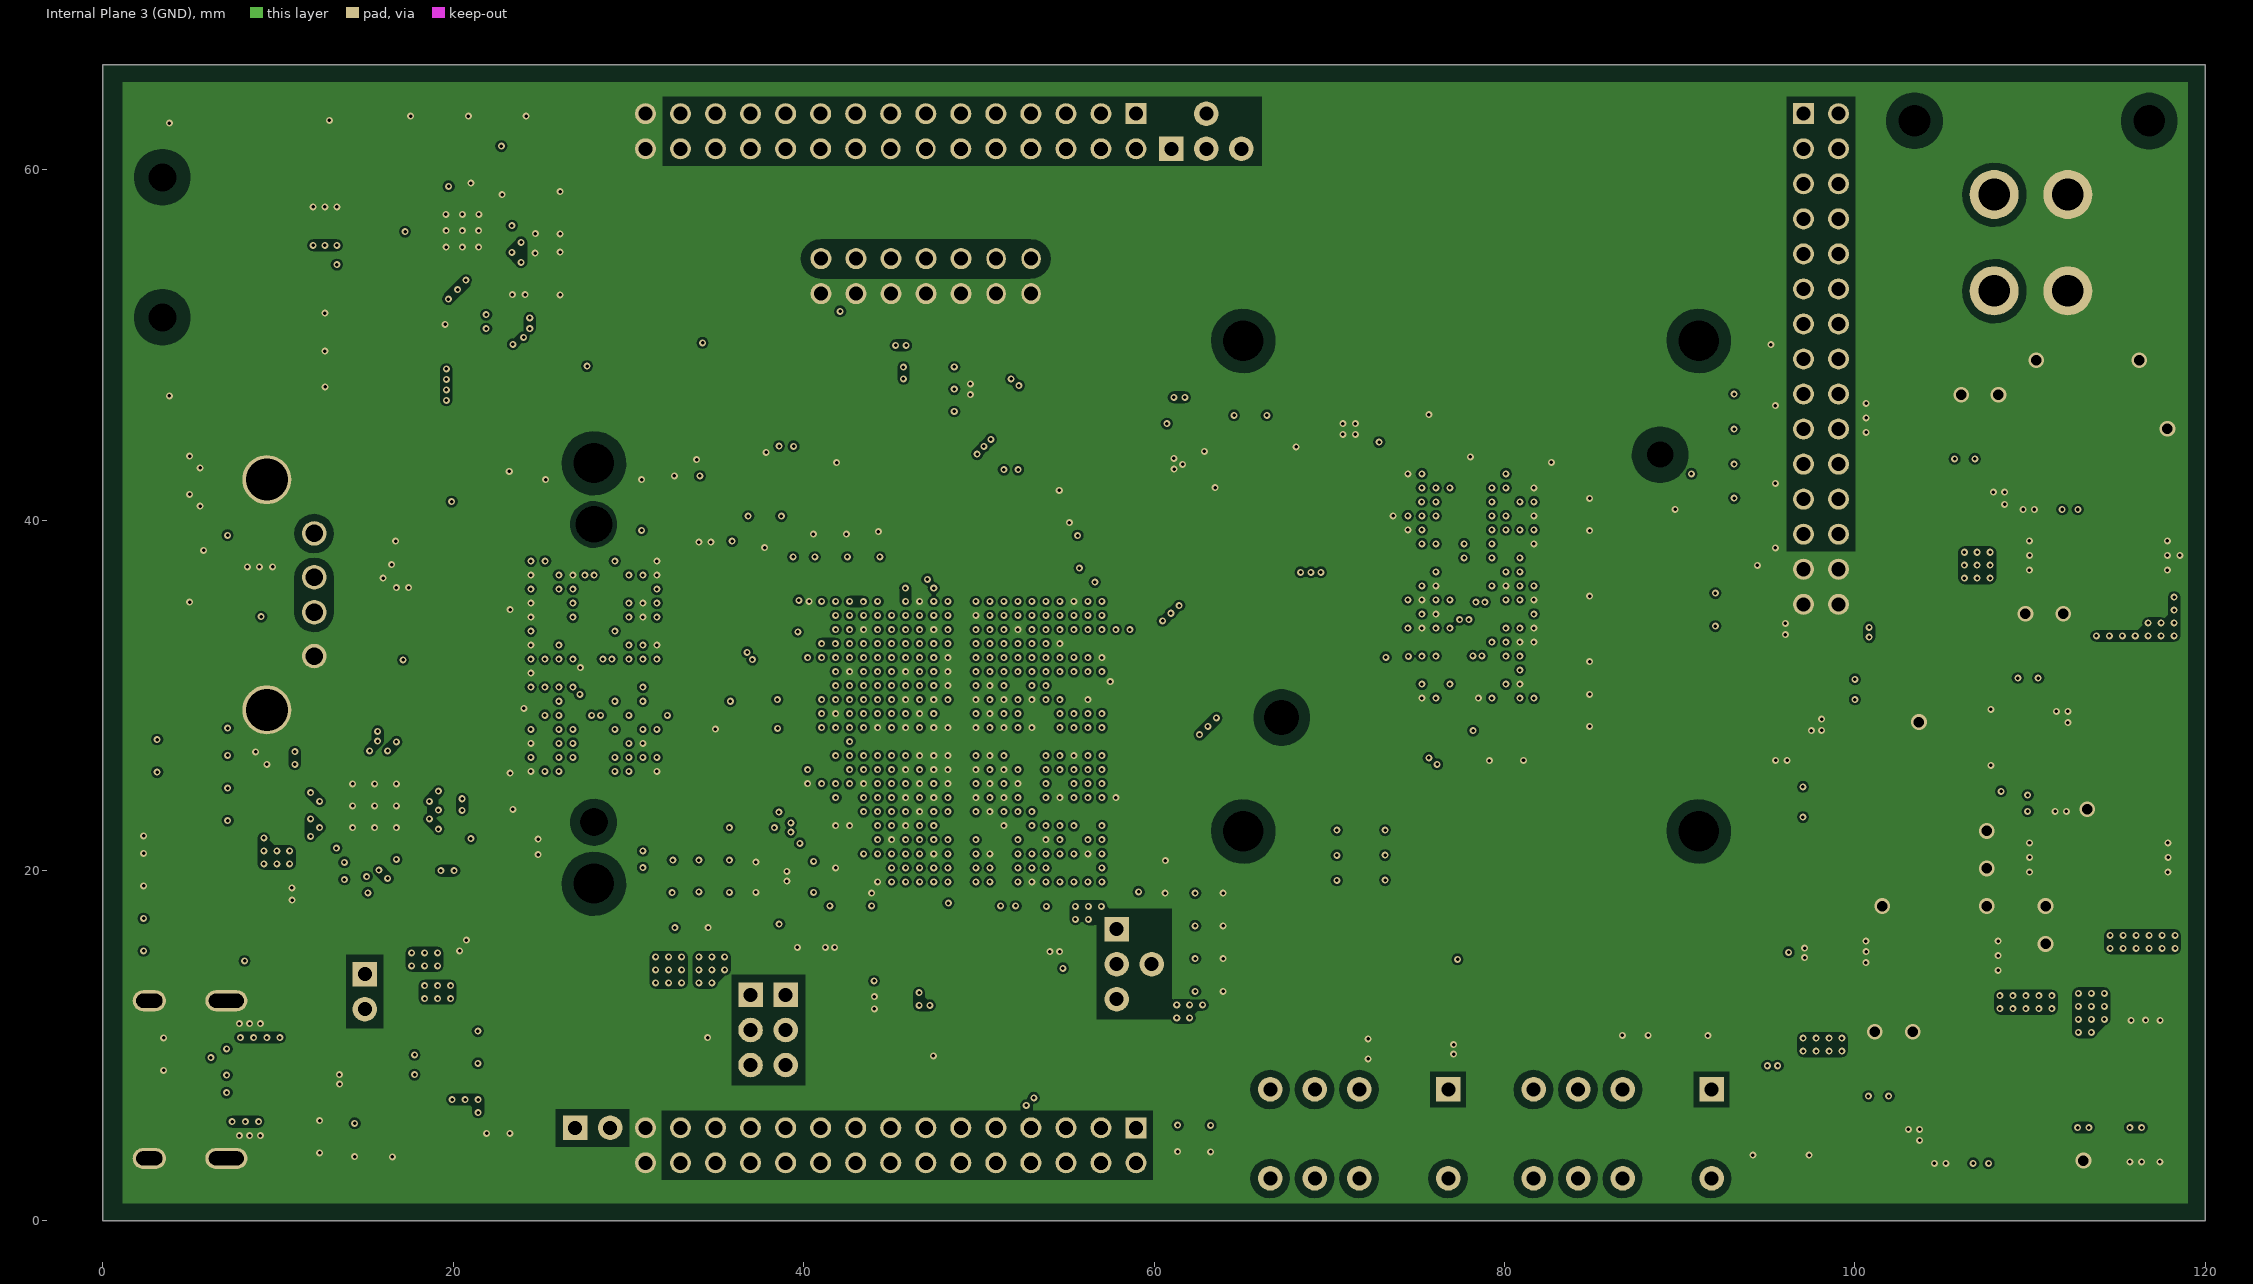
[diagram p9: Internal Plane 3 (GND)]

## Layer stack, top to bottom
Top Solder: solder mask 0.0102, Solder Resist, Dk 3.5
Top Layer: signal copper 0.04
Dielectric 2: prepreg 0.124, FR-4, Dk 4.2
Internal Plane 1 (GND): signal copper 0.018
Dielectric 6: prepreg 0.015, FR-4, Dk 4.2
Middle Layer 1: signal copper 0.018
Dielectric 4: prepreg 0.15, FR-4, Dk 4.2
Middle Layer 2: signal copper 0.018
Dielectric 8: prepreg 0.015, FR-4, Dk 4.2
Internal Plane 2 (+1.0V): signal copper 0.018
Dielectric 1: core 0.15, FR-4, Dk 4.2
Middle Layer 3: signal copper 0.018
Dielectric 9: prepreg 0.015, FR-4, Dk 4.2
Middle Layer 4: signal copper 0.018
Dielectric 5: prepreg 0.15, FR-4, Dk 4.2
Middle Layer 5 (PWR): signal copper 0.018
Dielectric 7: prepreg 0.015, FR-4, Dk 4.2
Internal Plane 3 (GND): signal copper 0.018
Dielectric 3: prepreg 0.124, FR-4, Dk 4.2
Bottom Layer: signal copper 0.04
Bottom Solder: solder mask 0.0102, Solder Resist, Dk 3.5

## Board outline
0,0 120,0 120,66 0,66

## Design rules (kind name [scope] priority, off if disabled: settings)
AssemblyTestPointUsage [All] p1 off:
AssemblyTestpoint [All] p1 off: testpointundercomponent=TRUE minsize=1.016 maxsize=2.54 preferedsize=1.524 minholesize=0 maxholesize=1.016 preferedholesize=0.813 testpointgrid=0.025 usegrid=TRUE gridtolerance=0 allowsidetop=TRUE allowsidebottom=TRUE
Clearance Clearance_PWR_B501_FPGA [(OnLayer('Middle Layer 5 (PWR)') AND InNet('PWR_B501_FPGA') AND InPolygon)] p1: gap=0.1 ignorepadtopadclearanceinfootprint=FALSE except(0: Arc-Hole Track-Hole SMDPad-Hole THPad-Hole Via-Hole Fill-Hole Poly-Hole Region-Hole Text-Hole)
Clearance Clearance_+1.35V_DCDC [(OnLayer('Middle Layer 5 (PWR)') AND InNet('+1.35V_DCDC') AND InPolygon)] p2: gap=0.1 ignorepadtopadclearanceinfootprint=FALSE except(0: Arc-Hole Track-Hole SMDPad-Hole THPad-Hole Via-Hole Fill-Hole Poly-Hole Region-Hole Text-Hole)
Clearance Clearance_PS_MIO_VREF_501 [(OnLayer('Bottom Layer') AND InNet('PS_MIO_VREF_501') AND InPolygon)] p3: gap=0.1 ignorepadtopadclearanceinfootprint=FALSE except(0: Arc-Hole Track-Hole SMDPad-Hole THPad-Hole Via-Hole Fill-Hole Poly-Hole Region-Hole Text-Hole)
Clearance Clearance_PWR_B13_FPGA [(OnLayer('Middle Layer 5 (PWR)') AND InNet('PWR_B13_FPGA') AND InPolygon)] p4: gap=0.1 ignorepadtopadclearanceinfootprint=FALSE except(0: Arc-Hole Track-Hole SMDPad-Hole THPad-Hole Via-Hole Fill-Hole Poly-Hole Region-Hole Text-Hole)
Clearance Clearance_NetD1.L2_J9 [(OnLayer('Bottom Layer') AND InNet('NetD1.L2_J9') AND InPolygon)] p5: gap=0.1 ignorepadtopadclearanceinfootprint=FALSE except(0: Arc-Hole Track-Hole SMDPad-Hole THPad-Hole Via-Hole Fill-Hole Poly-Hole Region-Hole Text-Hole)
Clearance Clearance_NetD1.L2_F11 [(OnLayer('Bottom Layer') AND InNet('NetD1.L2_F11') AND InPolygon)] p6: gap=0.1 ignorepadtopadclearanceinfootprint=FALSE except(0: Arc-Hole Track-Hole SMDPad-Hole THPad-Hole Via-Hole Fill-Hole Poly-Hole Region-Hole Text-Hole)
Clearance Clearance_VREF_DDR_M [(OnLayer('Middle Layer 5 (PWR)') AND InNet('VREF_DDR_M') AND InPolygon)] p7: gap=0.1 ignorepadtopadclearanceinfootprint=FALSE except(0: Arc-Hole Track-Hole SMDPad-Hole THPad-Hole Via-Hole Fill-Hole Poly-Hole Region-Hole Text-Hole)
Clearance Clearance_GND1 [(OnLayer('Internal Plane 1 (GND)') AND InNet('GND') AND InPolygon)] p8: gap=0.18 ignorepadtopadclearanceinfootprint=FALSE except(0: Arc-Hole Track-Hole SMDPad-Hole THPad-Hole Via-Hole Fill-Hole Poly-Hole Region-Hole Text-Hole; 0.13: Via-Fill Via-Poly Via-Region)
Clearance Clearance_GND2 [(OnLayer('Internal Plane 3 (GND)') AND InNet('GND') AND InPolygon)] p9: gap=0.18 ignorepadtopadclearanceinfootprint=FALSE except(0: Arc-Hole Track-Hole SMDPad-Hole THPad-Hole Via-Hole Fill-Hole Poly-Hole Region-Hole Text-Hole; 0.13: Via-Fill Via-Poly Via-Region)
Clearance Clearance_+1.35V_RAM_PL [(OnLayer('Middle Layer 5 (PWR)') AND InNet('+1.35V_RAM_PL') AND InPolygon)] p10: gap=0.1 ignorepadtopadclearanceinfootprint=FALSE except(0: Arc-Hole Track-Hole SMDPad-Hole THPad-Hole Via-Hole Fill-Hole Poly-Hole Region-Hole Text-Hole)
Clearance Clearance_PS_DDR_VRP [(OnLayer('Bottom Layer') AND InNet('PS_DDR_VRP') AND InPolygon)] p11: gap=0.1 ignorepadtopadclearanceinfootprint=FALSE except(0: Arc-Hole Track-Hole SMDPad-Hole THPad-Hole Via-Hole Fill-Hole Poly-Hole Region-Hole Text-Hole)
Clearance Clearance_PS_DDR_VRN [(OnLayer('Bottom Layer') AND InNet('PS_DDR_VRN') AND InPolygon)] p12: gap=0.1 ignorepadtopadclearanceinfootprint=FALSE except(0: Arc-Hole Track-Hole SMDPad-Hole THPad-Hole Via-Hole Fill-Hole Poly-Hole Region-Hole Text-Hole)
Clearance Clearance_+1.35V_RAM_PS [(OnLayer('Middle Layer 5 (PWR)') AND InNet('+1.35V_RAM_PS') AND InPolygon)] p13: gap=0.1 ignorepadtopadclearanceinfootprint=FALSE except(0: Arc-Hole Track-Hole SMDPad-Hole THPad-Hole Via-Hole Fill-Hole Poly-Hole Region-Hole Text-Hole)
Clearance Clearance_VCC_PLL [(OnLayer('Middle Layer 5 (PWR)') AND InNet('VCC_PLL') AND InPolygon)] p14: gap=0.1 ignorepadtopadclearanceinfootprint=FALSE except(0: Arc-Hole Track-Hole SMDPad-Hole THPad-Hole Via-Hole Fill-Hole Poly-Hole Region-Hole Text-Hole)
Clearance Clearance_+1.0V_DCDC [(OnLayer('Internal Plane 2 (+1.0V)') AND InNet('+1.0V_DCDC') AND InPolygon)] p15: gap=0.1 ignorepadtopadclearanceinfootprint=FALSE except(0: Arc-Hole Track-Hole SMDPad-Hole THPad-Hole Via-Hole Fill-Hole Poly-Hole Region-Hole Text-Hole)
Clearance Clearance_+3.3V_DCDC [(OnLayer('Internal Plane 2 (+1.0V)') AND InNet('+3.3V_DCDC') AND InPolygon)] p16: gap=0.1 ignorepadtopadclearanceinfootprint=FALSE except(0: Arc-Hole Track-Hole SMDPad-Hole THPad-Hole Via-Hole Fill-Hole Poly-Hole Region-Hole Text-Hole)
Clearance Clearance_MEM1_BUS.VREF_FPGA [(OnLayer('Middle Layer 5 (PWR)') AND InNet('MEM1_BUS.VREF_FPGA') AND InPolygon)] p17: gap=0.1 ignorepadtopadclearanceinfootprint=FALSE except(0: Arc-Hole Track-Hole SMDPad-Hole THPad-Hole Via-Hole Fill-Hole Poly-Hole Region-Hole Text-Hole)
Clearance Clearance_MEM0_BUS.VREF_PSM [(OnLayer('Middle Layer 5 (PWR)') AND InNet('MEM0_BUS.VREF_PSM') AND InPolygon)] p18: gap=0.1 ignorepadtopadclearanceinfootprint=FALSE except(0: Arc-Hole Track-Hole SMDPad-Hole THPad-Hole Via-Hole Fill-Hole Poly-Hole Region-Hole Text-Hole)
Clearance Clearance_+1.8V_DCDC [(OnLayer('Middle Layer 5 (PWR)') AND InNet('+1.8V_DCDC') AND InPolygon)] p19: gap=0.1 ignorepadtopadclearanceinfootprint=FALSE except(0: Arc-Hole Track-Hole SMDPad-Hole THPad-Hole Via-Hole Fill-Hole Poly-Hole Region-Hole Text-Hole)
Clearance Clearance_PWR_B34_FPGA [(OnLayer('Middle Layer 5 (PWR)') AND InNet('PWR_B34_FPGA') AND InPolygon)] p20: gap=0.1 ignorepadtopadclearanceinfootprint=FALSE except(0: Arc-Hole Track-Hole SMDPad-Hole THPad-Hole Via-Hole Fill-Hole Poly-Hole Region-Hole Text-Hole)
Clearance Clearance_PWR_B35_FPGA [(OnLayer('Middle Layer 5 (PWR)') AND InNet('PWR_B35_FPGA') AND InPolygon)] p21: gap=0.1 ignorepadtopadclearanceinfootprint=FALSE except(0: Arc-Hole Track-Hole SMDPad-Hole THPad-Hole Via-Hole Fill-Hole Poly-Hole Region-Hole Text-Hole)
Clearance "Board Edge Clearance" [All vs OnLayer('Keep-out layer')] p22: gap=0.3 ignorepadtopadclearanceinfootprint=FALSE except(0: Arc-Hole Track-Hole SMDPad-Hole THPad-Hole Via-Hole Fill-Hole Poly-Hole Region-Hole Text-Hole)
Clearance "Poly Clearance" [InPolygon] p23: gap=0.18 ignorepadtopadclearanceinfootprint=FALSE except(0: Arc-Hole Track-Hole SMDPad-Hole THPad-Hole Via-Hole Fill-Hole Poly-Hole Region-Hole Text-Hole)
Clearance "Generic Clearance" [All] p24: gap=0.1 ignorepadtopadclearanceinfootprint=FALSE except(0: Arc-Hole Track-Hole SMDPad-Hole THPad-Hole Via-Hole Fill-Hole Poly-Hole Region-Hole Text-Hole)
ComponentClearance [All] p1 off: gap=0.254 collisioncheckmode=3 verticalgap=0.254 showdistances=FALSE
DiffPairsRouting [All] p1: maxlimit=0.254 minlimit=0.2 mostfreqgap=0.2 toplayer_minwidth=0.1 toplayer_maxwidth=0.254 toplayer_prefwidth=0.2 midlayer1_minwidth=0.1 midlayer1_maxwidth=0.254 midlayer1_prefwidth=0.2 midlayer2_minwidth=0.1 midlayer2_maxwidth=0.254 midlayer2_prefwidth=0.2 midlayer3_minwidth=0.1 midlayer3_maxwidth=0.254 midlayer3_prefwidth=0.2 midlayer4_minwidth=0.1 midlayer4_maxwidth=0.254 midlayer4_prefwidth=0.2 midlayer5_minwidth=0.1 midlayer5_maxwidth=0.254 midlayer5_prefwidth=0.2 midlayer6_minwidth=0.1 midlayer6_maxwidth=0.254 midlayer6_prefwidth=0.2 midlayer7_minwidth=0.1 midlayer7_maxwidth=0.254 midlayer7_prefwidth=0.2 midlayer8_minwidth=0.1 midlayer8_maxwidth=0.254 midlayer8_prefwidth=0.2 bottomlayer_minwidth=0.1 bottomlayer_maxwidth=0.254 bottomlayer_prefwidth=0.2 maxuncoupledlength=12.7
FabricationTestPointUsage [All] p1 off: valid=0 allowmultiple=FALSE
FabricationTestpoint [All] p1 off: side=3 testpointundercomponent=TRUE minsize=1.016 maxsize=2.54 preferedsize=1.524 minholesize=0 maxholesize=1.016 preferedholesize=0.813 testpointgrid=0.025 allowsidetop=TRUE allowsidebottom=TRUE usegrid=TRUE gridtolerance=0
Height [All] p1: minheight=0 maxheight=50.4 prefheight=12.7
HoleSize [All] p1: absolutevalues=TRUE maxlimit=10 minlimit=0.025 maxpercent=80.000 minpercent=20.000
MatchedLengths "Schematic Matched Net Lengths_6" [InNetClass('BANK13')] p1: tolerance=1 checknetsindiffpair=FALSE checkdiffpairvsdiffpair=TRUE checkxsignals=TRUE checkothers=TRUE
MatchedLengths "Schematic Matched Net Lengths_DDR3_PS" [InxSignalClass('DDR3_PS')] p2: tolerance=0.1 checknetsindiffpair=FALSE checkdiffpairvsdiffpair=TRUE checkxsignals=TRUE checkothers=TRUE
MatchedLengths "Schematic Matched Net Lengths_DDR3_PL" [InxSignalClass('DDR3_PL')] p3: tolerance=0.1 checknetsindiffpair=FALSE checkdiffpairvsdiffpair=TRUE checkxsignals=TRUE checkothers=TRUE
MatchedLengths "Schematic Matched Net Lengths_7" [InxSignalClass('QSPI_FLASH')] p4: tolerance=2 checknetsindiffpair=FALSE checkdiffpairvsdiffpair=TRUE checkxsignals=TRUE checkothers=TRUE usedelayunits=TRUE delaytolerance=100.000000
MatchedLengths "Schematic Matched Net Lengths_5" [InNetClass('SD_DATA')] p5: tolerance=2 checknetsindiffpair=FALSE checkdiffpairvsdiffpair=TRUE checkxsignals=TRUE checkothers=TRUE
MatchedLengths "Schematic Matched Net Lengths_4" [InNetClass('SD_DATA_ZINQ')] p6: tolerance=2 checknetsindiffpair=FALSE checkdiffpairvsdiffpair=TRUE checkxsignals=TRUE checkothers=TRUE
MatchedLengths "Schematic Matched Net Lengths_ETHERNET" [InNetClass('ETHERNET')] p7: tolerance=0.1 checknetsindiffpair=FALSE checkdiffpairvsdiffpair=TRUE checkxsignals=TRUE checkothers=TRUE
MatchedLengths "Schematic Matched Net Lengths_2" [InNet('USB_UART_D_N')] p8: tolerance=25.4 checknetsindiffpair=TRUE checkdiffpairvsdiffpair=FALSE checkxsignals=FALSE checkothers=FALSE usedelayunits=TRUE delaytolerance=100.000000
MatchedLengths "Schematic Matched Net Lengths_1" [InNet('USB_UART_D_P')] p9: tolerance=25.4 checknetsindiffpair=TRUE checkdiffpairvsdiffpair=FALSE checkxsignals=FALSE checkothers=FALSE usedelayunits=TRUE delaytolerance=100.000000
MatchedLengths "Schematic Matched Net Lengths" [InNetClass('USB_HOST_DATA')] p10: tolerance=0.1 checknetsindiffpair=FALSE checkdiffpairvsdiffpair=TRUE checkxsignals=TRUE checkothers=TRUE
MinimumAnnularRing "MinimumAnnularRing_Pad 1.6+" [PadIsPlated and (HoleSize > AsMM(1.6))] p1 off: minimumring=0.4
MinimumAnnularRing "MinimumAnnularRing_Pad 0.8-1.6" [PadIsPlated and (HoleSize > AsMM(1.1)) and (HoleSize <= AsMM(1.6))] p2 off: minimumring=0.275
MinimumAnnularRing "MinimumAnnularRing_Pad 0.4-0.7" [PadIsPlated and (HoleSize <= AsMM(1.1))] p3 off: minimumring=0.25
MinimumSolderMaskSliver [All] p1: minsoldermaskwidth=0.05
PlaneConnect [All] p1: planeconnectstyle=Relief reliefexpansion=0.508 reliefentries=4 reliefconductorwidth=0.508 reliefairgap=0.254
PolygonConnect PolygonConnect_+3.3V_SD [InNet('+3.3V_SD_PWR') AND IsVia] p1: connectstyle=Direct reliefconductorwidth=0.254 reliefentries=4 polygonreliefangle="90 Angle" airgapwidth=0.254
PolygonConnect PolygonConnect_+5V_USB_UART [InNet('+5V_USB_UART') AND IsVia] p2: connectstyle=Direct reliefconductorwidth=0.254 reliefentries=4 polygonreliefangle="90 Angle" airgapwidth=0.254
PolygonConnect PolygonConnect_+5V_FROM_USB [InNet('+5V_FROM_USB') AND IsVia] p3: connectstyle=Direct reliefconductorwidth=0.254 reliefentries=4 polygonreliefangle="90 Angle" airgapwidth=0.254
PolygonConnect PolygonConnect_+5V_RELE [InNet('+5V_RELE') AND IsVia] p4: connectstyle=Direct reliefconductorwidth=0.254 reliefentries=4 polygonreliefangle="90 Angle" airgapwidth=0.254
PolygonConnect PolygonConnect_+5V_MAIN [InNet('+5V_MAIN') AND IsVia] p5: connectstyle=Direct reliefconductorwidth=0.254 reliefentries=4 polygonreliefangle="90 Angle" airgapwidth=0.254
PolygonConnect PolygonConnect_+1.0V_DCDC [InNet('+1.0V_DCDC') AND IsVia] p6: connectstyle=Direct reliefconductorwidth=0.254 reliefentries=4 polygonreliefangle="90 Angle" airgapwidth=0.254
PolygonConnect PolygonConnect_VCC_PLL [InNet('VCC_PLL') AND IsVia] p7: connectstyle=Direct reliefconductorwidth=0.254 reliefentries=4 polygonreliefangle="90 Angle" airgapwidth=0.254
PolygonConnect PolygonConnect_NetD1.L2_J9 [InNet('NetD1.L2_J9') AND IsVia] p8: connectstyle=Direct reliefconductorwidth=0.254 reliefentries=4 polygonreliefangle="90 Angle" airgapwidth=0.254
PolygonConnect PolygonConnect_NetD1.L2_F11 [InNet('NetD1.L2_F11') AND IsVia] p9: connectstyle=Direct reliefconductorwidth=0.254 reliefentries=4 polygonreliefangle="90 Angle" airgapwidth=0.254
PolygonConnect PolygonConnect_MEM0_BUS.VREF_PSM [InNet('MEM0_BUS.VREF_PSM') AND IsVia] p10: connectstyle=Direct reliefconductorwidth=0.254 reliefentries=4 polygonreliefangle="90 Angle" airgapwidth=0.254
PolygonConnect PolygonConnect_PL_DDR_B35_VREF [InNet('PL_DDR_B35_VREF') AND IsVia] p11: connectstyle=Direct reliefconductorwidth=0.254 reliefentries=4 polygonreliefangle="90 Angle" airgapwidth=0.254
PolygonConnect PolygonConnect_PL_DDR_B34_VREF [InNet('PL_DDR_B34_VREF') AND IsVia] p12: connectstyle=Direct reliefconductorwidth=0.254 reliefentries=4 polygonreliefangle="90 Angle" airgapwidth=0.254
PolygonConnect PolygonConnect_PS_MIO_VREF_501 [InNet('PS_MIO_VREF_501') AND IsVia] p13: connectstyle=Direct reliefconductorwidth=0.254 reliefentries=4 polygonreliefangle="90 Angle" airgapwidth=0.254
PolygonConnect PolygonConnect_PS_DDR_VRP [InNet('PS_DDR_VRP') AND IsVia] p14: connectstyle=Direct reliefconductorwidth=0.254 reliefentries=4 polygonreliefangle="90 Angle" airgapwidth=0.254
PolygonConnect PolygonConnect_PS_DDR_VRN [InNet('PS_DDR_VRN') AND IsVia] p15: connectstyle=Direct reliefconductorwidth=0.254 reliefentries=4 polygonreliefangle="90 Angle" airgapwidth=0.254
PolygonConnect PolygonConnect_MEM1_BUS.VREF_FPGA [InNet('MEM1_BUS.VREF_FPGA') AND IsVia] p16: connectstyle=Direct reliefconductorwidth=0.254 reliefentries=4 polygonreliefangle="90 Angle" airgapwidth=0.254
PolygonConnect PolygonConnect_+1.8V_DCDC [InNet('+1.8V_DCDC') AND IsVia] p17: connectstyle=Direct reliefconductorwidth=0.254 reliefentries=4 polygonreliefangle="90 Angle" airgapwidth=0.254
PolygonConnect PolygonConnect_+1.35V_DCDC [InNet('+1.35V_DCDC') AND IsVia] p18: connectstyle=Direct reliefconductorwidth=0.254 reliefentries=4 polygonreliefangle="90 Angle" airgapwidth=0.254
PolygonConnect PolygonConnect_+1.35V_RAM_PL [InNet('+1.35V_RAM_PL') AND IsVia] p19: connectstyle=Direct reliefconductorwidth=0.254 reliefentries=4 polygonreliefangle="90 Angle" airgapwidth=0.254
PolygonConnect PolygonConnect_+1.35V_RAM_PS [InNet('+1.35V_RAM_PS') AND IsVia] p20: connectstyle=Direct reliefconductorwidth=0.254 reliefentries=4 polygonreliefangle="90 Angle" airgapwidth=0.254
PolygonConnect PolygonConnect_+3.3V_DCDC [InNet('+3.3V_DCDC') AND IsVia] p21: connectstyle=Direct reliefconductorwidth=0.254 reliefentries=4 polygonreliefangle="90 Angle" airgapwidth=0.254
PolygonConnect PolygonConnect_PWR_B34_FPGA [InNet('PWR_B34_FPGA') AND IsVia] p22: connectstyle=Direct reliefconductorwidth=0.254 reliefentries=4 polygonreliefangle="90 Angle" airgapwidth=0.254
PolygonConnect PolygonConnect_PWR_B35_FPGA [InNet('PWR_B35_FPGA') AND IsVia] p23: connectstyle=Direct reliefconductorwidth=0.254 reliefentries=4 polygonreliefangle="90 Angle" airgapwidth=0.254
PolygonConnect PolygonConnect_PWR_B13_FPGA_1 [InNet('PWR_B13_FPGA') AND IsVia] p24: connectstyle=Direct reliefconductorwidth=0.254 reliefentries=4 polygonreliefangle="90 Angle" airgapwidth=0.254
PolygonConnect PolygonConnect_PWR_B501_FPGA [InNet('PWR_B501_FPGA') AND IsVia] p25: connectstyle=Direct reliefconductorwidth=0.254 reliefentries=4 polygonreliefangle="90 Angle" airgapwidth=0.254
PolygonConnect PolygonConnect_+1.8V_USB_OTG [InNet('+1.8V_USB_OTG') AND IsVia] p26: connectstyle=Direct reliefconductorwidth=0.254 reliefentries=4 polygonreliefangle="90 Angle" airgapwidth=0.254
PolygonConnect PolygonConnect_NetC17.L3_1 [InNet('NetC17.L3_1') AND IsVia] p27: connectstyle=Direct reliefconductorwidth=0.254 reliefentries=4 polygonreliefangle="90 Angle" airgapwidth=0.254
PolygonConnect PolygonConnect_USB_PWR_IN [InNet('USB_PWR_IN') AND IsVia] p28: connectstyle=Direct reliefconductorwidth=0.254 reliefentries=4 polygonreliefangle="90 Angle" airgapwidth=0.254
PolygonConnect PolygonConnect_VREF_DDR_M [InNet('VREF_DDR_M') AND IsVia] p29: connectstyle=Direct reliefconductorwidth=0.254 reliefentries=4 polygonreliefangle="90 Angle" airgapwidth=0.254
PolygonConnect PolygonConnect_USB_VDDIO_PWR [InNet('USB_VDDIO_PWR') AND IsVia] p30: connectstyle=Direct reliefconductorwidth=0.254 reliefentries=4 polygonreliefangle="90 Angle" airgapwidth=0.254
PolygonConnect PolygonConnect_+3.3V_USB_OTG [InNet('+3.3V_USB_OTG') AND IsVia] p31: connectstyle=Direct reliefconductorwidth=0.254 reliefentries=4 polygonreliefangle="90 Angle" airgapwidth=0.254
PolygonConnect PolygonConnect_+3.3V_SD_IO [InNet('SD_IO_PWR') AND IsVia] p32: connectstyle=Direct reliefconductorwidth=0.254 reliefentries=4 polygonreliefangle="90 Angle" airgapwidth=0.254
PolygonConnect PolygonConnect_+3.3V [InNet('+3.3V') AND IsVia] p33: connectstyle=Direct reliefconductorwidth=0.254 reliefentries=4 polygonreliefangle="90 Angle" airgapwidth=0.254
PolygonConnect PolygonConnect_+5V_D [InNet('+5V_D') AND IsVia] p34: connectstyle=Direct reliefconductorwidth=0.254 reliefentries=4 polygonreliefangle="90 Angle" airgapwidth=0.254
PolygonConnect PolygonConnect_GND [InNet('GND') AND IsVia OR IsPad] p35: connectstyle=Direct reliefconductorwidth=0.254 reliefentries=4 polygonreliefangle="90 Angle" airgapwidth=0.254
PolygonConnect [All] p36: connectstyle=Relief reliefconductorwidth=0.381 reliefentries=4 polygonreliefangle="90 Angle" airgapwidth=0.254
RoutingVias RoutingVias_BGA [WithinRoom('BGA_Room')] p1: holewidth=0.2 width=0.45 viastyle="Through Hole" minholewidth=0.2 minwidth=0.45 maxholewidth=0.2 maxwidth=0.45
RoutingVias [All] p2: holewidth=1.2 width=1.2 viastyle="Through Hole" minholewidth=0.2 minwidth=0.4 maxholewidth=6 maxwidth=6
SilkToSilkClearance [All] p1 off: silktosilkclearance=0.254
SilkToSolderMaskClearance [IsPad vs Istext] p1: minsilkscreentomaskgap=0.1 clearancetoexposedcopper=TRUE
SolderMaskExpansion SolderMaskExpansion_Via [IsVia] p1: expansion=-2 istentingtop=FALSE
SolderMaskExpansion [All] p2: expansion=0.1 istentingtop=FALSE
Width Width_BGA [WithinRoom('BGA_Room')] p1: maxlimit=0.3 minlimit=0.1 preferedwidth=0.1 minimp=50.000000 maximp=50.000000 favimp=50.000000
Width [All] p2: maxlimit=5.08 minlimit=0.1 preferedwidth=0.381 toplayer_maxwidth=2 midlayer7_prefwidth=0.254 midlayer8_prefwidth=0.254 bottomlayer_maxwidth=2 minimp=50.000000 maximp=50.000000 favimp=50.000000
18 further rules are at their usual default settings.

## Classes and differential pairs
differential pair class USB_UART: USB_UART_D
differential pair class USB_HOST: USB_HT_D
differential pair class DIFF100: CLK CLK_M LDQS LDQS_M MEM0_BUS.MEM_CLK_PSM.UDQS_PSM MEM1_BUS.MEM_CLK.UDQS
net class USB_HT_D[0..7]: FPGA_USB.USB_HT_D0 FPGA_USB.USB_HT_D1 FPGA_USB.USB_HT_D2 FPGA_USB.USB_HT_D3 FPGA_USB.USB_HT_D4 FPGA_USB.USB_HT_D5 FPGA_USB.USB_HT_D6 FPGA_USB.USB_HT_D7
net class USB_HOST_DATA: FPGA_USB.USB_HT_CLKO FPGA_USB.USB_HT_D0 FPGA_USB.USB_HT_D1 FPGA_USB.USB_HT_D2 FPGA_USB.USB_HT_D3 FPGA_USB.USB_HT_D4 FPGA_USB.USB_HT_D5 FPGA_USB.USB_HT_D6 FPGA_USB.USB_HT_D7 FPGA_USB.USB_HT_DIR FPGA_USB.USB_HT_nRST FPGA_USB.USB_HT_NXT FPGA_USB.USB_HT_STP
net class SD_DATA: SD_CLK_B0 SD_CMD_B0 SD_D0_B0 SD_D1_B0 SD_D2_B0 SD_D3_B0
net class SD_DATA_ZINQ: FPGA_SD_CARD.SD_CLK FPGA_SD_CARD.SD_CMD FPGA_SD_CARD.SD_D0 FPGA_SD_CARD.SD_D1 FPGA_SD_CARD.SD_D2 FPGA_SD_CARD.SD_D3
net class MEM1_DATA: DQ0 DQ1 DQ2 DQ3 DQ4 DQ5 DQ6 DQ7 DQ8 DQ9 DQ10 DQ11 DQ12 DQ13 DQ14 DQ15 LDM MEM1_BUS.UDM
net class MEM1_CLK: CLK_N CLK_P LDQS_N LDQS_P MEM1_BUS.MEM_CLK.UDQS_N MEM1_BUS.MEM_CLK.UDQS_P
net class MEM1_ADDR_CMD: A0 A1 A2 A3 A4 A5 A6 A7 A8 A9 A10 A11 A12 A13 A14 A15 BA0 BA1 BA2 CKE MEM1_BUS.MEM_CMD.CAS MEM1_BUS.MEM_CMD.CS MEM1_BUS.MEM_CMD.RAS MEM1_BUS.MEM_CMD.WE
net class MEM0_DATA: DQ_M0 DQ_M1 DQ_M2 DQ_M3 DQ_M4 DQ_M5 DQ_M6 DQ_M7 DQ_M8 DQ_M9 DQ_M10 DQ_M11 DQ_M12 DQ_M13 DQ_M14 DQ_M15 LDM_M MEM0_BUS.UDM_PSM
net class MEM0_CLK: CLK_M_N CLK_M_P LDQS_M_N LDQS_M_P MEM0_BUS.MEM_CLK_PSM.UDQS_PSM_N MEM0_BUS.MEM_CLK_PSM.UDQS_PSM_P
net class MEM0_ADDR_CMD: ADDR0 ADDR1 ADDR2 ADDR3 ADDR4 ADDR5 ADDR6 ADDR7 ADDR8 ADDR9 ADDR10 ADDR11 ADDR12 ADDR13 ADDR14 BA_M0 BA_M1 BA_M2 CKE_M MEM0_BUS.MEM_CMD_PSM.CAS_PSM MEM0_BUS.MEM_CMD_PSM.CS_PSM MEM0_BUS.MEM_CMD_PSM.RAS_PSM MEM0_BUS.MEM_CMD_PSM.WE_PSM
net class ETHERNET: ETH_COL_B501 ETH_CRS_B501 ETH_INT_B501 ETH_MDC_B501 ETH_MDIO_B501 ETH_RXCK_B501 ETH_RXCTL_B501 ETH_RXD0_B501 ETH_RXD1_B501 ETH_RXD2_B501 ETH_RXD3_B501 ETH_RXER_B501 ETH_TXCK_B501 ETH_TXCTL_B501 ETH_TXD0_B501 ETH_TXD1_B501 ETH_TXD2_B501 ETH_TXD3_B501
net class DQ_M[15..0]: DQ_M0 DQ_M1 DQ_M2 DQ_M3 DQ_M4 DQ_M5 DQ_M6 DQ_M7 DQ_M8 DQ_M9 DQ_M10 DQ_M11 DQ_M12 DQ_M13 DQ_M14 DQ_M15
net class BANK13: FPGA_BANK13.IO_L6N_T0_VREF_13 FPGA_BANK13.IO_L11N_T1_SRCC_13 FPGA_BANK13.IO_L11P_T1_SRCC_13 FPGA_BANK13.IO_L12N_T1_MRCC_13 FPGA_BANK13.IO_L12P_T1_MRCC_13 FPGA_BANK13.IO_L13N_T2_MRCC_13 FPGA_BANK13.IO_L14N_T2_SRCC_13 FPGA_BANK13.IO_L14P_T2_SRCC_13 FPGA_BANK13.IO_L15N_T2_DQS_13 FPGA_BANK13.IO_L15P_T2_DQS_13 FPGA_BANK13.IO_L16N_T2_13 FPGA_BANK13.IO_L16P_T2_13 FPGA_BANK13.IO_L17N_T2_13 FPGA_BANK13.IO_L17P_T2_13 FPGA_BANK13.IO_L18N_T2_13 FPGA_BANK13.IO_L18P_T2_13 FPGA_BANK13.IO_L19N_T3_VREF_13 FPGA_BANK13.IO_L19P_T3_13 FPGA_BANK13.IO_L20N_T3_13 FPGA_BANK13.IO_L20P_T3_13
net class BA_M[2..0]: BA_M0 BA_M1 BA_M2
net class BA[2..0]: BA0 BA1 BA2
net class ADDR[14..0]: ADDR0 ADDR1 ADDR2 ADDR3 ADDR4 ADDR5 ADDR6 ADDR7 ADDR8 ADDR9 ADDR10 ADDR11 ADDR12 ADDR13 ADDR14
component class ZYNQ: C1.L2 C2.L2 C3.L2 C4.L2 C5.L2 C6.L2 C7.L2 C8.L2 C9.L2 C10.L2 C11.L2 C12.L2 C13.L2 C14.L2 C15.L2 C16.L2 C17.L2 C18.L2 C19.L2 C20.L2 C21.L2 C22.L2 C23.L2 C24.L2 C25.L2 C26.L2 C27.L2 C28.L2 C29.L2 C30.L2 C31.L2 C32.L2 C33.L2 C34.L2 C35.L2 C36.L2 C37.L2 C38.L2 C39.L2 C40.L2 C41.L2 C42.L2 C43.L2 C44.L2 C45.L2 C46.L2 C47.L2 C48.L2 C49.L2 C50.L2 D1.L2 D2.L2 D3.L2 D4.L2 KP1.L2 KP2.L2 KP3.L2 KP4.L2 KP5.L2 KP6.L2 KP7.L2 KP8.L2 KP9.L2 L1.L2 L2.L2 R1.L2 R2.L2 R3.L2 R4.L2 R5.L2 R6.L2 R7.L2 R8.L2 R9.L2 R10.L2 R11.L2 R12.L2 R13.L2 R14.L2 R15.L2 R16.L2 R17.L2 R18.L2 R19.L2 R20.L2 R21.L2 R22.L2 R23.L2 R24.L2 R25.L2 R26.L2 R27.L2 R28.L2 R29.L2 R30.L2 R31.L2 R32.L2 R33.L2 R34.L2 R35.L2 R36.L2 R37.L2 R38.L2 R39.L2 R40.L2 R44.L2 R45.L2 R46.L2 R47.L2 SA1.L2 SA2.L2 SA3.L2 VD1.L2 VD2.L2 VD3.L2 VD4.L2 VD5.L2 VT1.L2
component class ZYNQ_MAIN: R1.L1 R2.L1 X1.L1 X2.L1 X3.L1 X4.L1 X5.L1 X6.L1 X7.L1 X8.L1 X9.L1 X10.L1 X11.L1
component class "USB HOST": C1.L5 C2.L5 C3.L5 C4.L5 C5.L5 C6.L5 C7.L5 C8.L5 C9.L5 C10.L5 C11.L5 C12.L5 C13.L5 C14.L5 D1.L5 D2.L5 KP1.L5 R1.L5 R2.L5 R3.L5 R4.L5 R5.L5 R6.L5 R7.L5 R8.L5 R9.L5 R10.L5 R11.L5 R12.L5 R13.L5 R14.L5 R15.L5 VD1.L5 X1.L5 ZQ1.L5
component class UART: C1.L4 C2.L4 C3.L4 C4.L4 D1.L4 R1.L4 R2.L4 R3.L4 R4.L4 R5.L4 R6.L4 R7.L4 R8.L4 R9.L4 R10.L4 R11.L4 TNOW VD1.L4 VD2.L4 VD3.L4 VD4.L4 X1.L4
component class "SD CARD": C1.L6 C2.L6 C3.L6 C4.L6 D1.L6 R1.L6 R2.L6 R3.L6 R4.L6 R5.L6 R6.L6 R7.L6 X1.L6
component class "DDR ZIF": C1.L9 C2.L9 C3.L9 C4.L9 C5.L9 C6.L9 C7.L9 C8.L9 C9.L9 C10.L9 C11.L9 C12.L9 C13.L9 C14.L9 C15.L9 C16.L9 C17.L9 D1.L9 R1.L9 R2.L9 R3.L9 R4.L9 R5.L9
component class "DDR3L ZIF": K1.L8 K2.L8 R1.L8 R2.L8 R3.L8 R4.L8 R5.L8 R6.L8 R7.L8 R8.L8 VD1.L8 VD2.L8 VT1.L8 VT2.L8
component class "DDR3L PS": C1.L7 C2.L7 C3.L7 C4.L7 C5.L7 C6.L7 C7.L7 C8.L7 C9.L7 C10.L7 C11.L7 C12.L7 C13.L7 C14.L7 C15.L7 C16.L7 C17.L7 D1.L7 KP1.L7 R1.L7 R2.L7 R3.L7 R4.L7 R5.L7 R6.L7
net class A[15..0]: A0 A1 A2 A3 A4 A5 A6 A7 A8 A9 A10 A11 A12 A13 A14 A15
net class DQ[15..0]: DQ0 DQ1 DQ2 DQ3 DQ4 DQ5 DQ6 DQ7 DQ8 DQ9 DQ10 DQ11 DQ12 DQ13 DQ14 DQ15
component class Power: C1.L3 C2.L3 C3.L3 C4.L3 C5.L3 C6.L3 C7.L3 C8.L3 C9.L3 C10.L3 C11.L3 C12.L3 C13.L3 C14.L3 C15.L3 C16.L3 C17.L3 C18.L3 C19.L3 C20.L3 C21.L3 C22.L3 C23.L3 C24.L3 C25.L3 C26.L3 C27.L3 C28.L3 C29.L3 C30.L3 C31.L3 C32.L3 C33.L3 C34.L3 D1.L3 D2.L3 D3.L3 D4.L3 L1.L3 L2.L3 L3.L3 L4.L3 R1.L3 R2.L3 R3.L3 R4.L3 R5.L3 R6.L3 R7.L3 R8.L3 R9.L3 R10.L3 R11.L3 R12.L3 R13.L3 R14.L3 R15.L3 R16.L3 R17.L3 R18.L3 R19.L3 R20.L3 R21.L3 R22.L3 VD1.L3 VD2.L3 VT1.L3 VT2.L3 VT3.L3 VT4.L3
differential pair USB_UART_D: +USB_UART_D_P -USB_UART_D_N
differential pair USB_HT_D: +USB_HT_D_P -USB_HT_D_N
differential pair MEM1_BUS.MEM_CLK.UDQS: +MEM1_BUS.MEM_CLK.UDQS_P -MEM1_BUS.MEM_CLK.UDQS_N
differential pair MEM0_BUS.MEM_CLK_PSM.UDQS_PSM: +MEM0_BUS.MEM_CLK_PSM.UDQS_PSM_P -MEM0_BUS.MEM_CLK_PSM.UDQS_PSM_N
differential pair LDQS: +LDQS_P -LDQS_N
differential pair LDQS_M: +LDQS_M_P -LDQS_M_N
differential pair CLK: +CLK_P -CLK_N
differential pair CLK_M: +CLK_M_P -CLK_M_N

## Components (designator, comment, footprint, x,y, rotation, side; value= is the part's Value field where it differs from the comment)
C1.L2 "0.1uF,50V (0603)" 0603#1 39.802,22.454 r0 bottom
C1.L3 "22uF,10V (0805)" 0805 109.73,33.705 r90 top
C1.L4 "10uF,16V (0805)" 0805 11.73,16.1 r180 top
C1.L5 "0.1uF,50V (0805)" 0805 9.99,26.425 r180 bottom
C1.L6 "0.1uF,50V (0805)" 0805 22.792,53.266 r0 bottom
C1.L7 "10uF,10V (0603)" 0603#1 22.32,36.95 r180 bottom
C1.L9 "10uF,10V (0603)" 0603#1 80.07,27.25 r270 bottom
C2.L2 "0.1uF,50V (0603)" 0603#1 59.071,29.21 r270 bottom
C2.L3 "22uF,10V (0805)" 0805 102.705,28.48 r0 top
C2.L4 "0.1uF,50V (0805)" 0805 11.73,13.93 r180 top
C2.L5 "10uF,16V (0805)" 0805 4.31,43.32 r0 bottom
C2.L6 "10uF,16V (0805)" 0805 14.99,49.649 r180 bottom
C2.L7 "0.1uF,50V (0603)" 0603#1 25.26,40.16 r90 bottom
C2.L9 "0.1uF,50V (0603)" 0603#1 72.08,36.725 r180 bottom
C3.L2 "0.1uF,50V (0603)" 0603#1 59.07,25.94 r90 bottom
C3.L3 "22uF,10V (0805)" 0805 101.125,9.85 r90 top
C3.L4 "10uF,16V (0805)" 0805 16.52,4.61 r270 top
C3.L5 "0.1uF,50V (0805)" 0805 4.31,41.14 r0 bottom
C3.L6 "0.1uF,50V (0805)" 0805 14.99,47.48 r180 bottom
C3.L7 "10uF,10V (0603)" 0603#1 30.62,40.16 r90 bottom
C3.L9 "10uF,10V (0603)" 0603#1 72.08,34.87 r180 bottom
C4.L2 "0.1uF,50V (0603)" 0603#1 54.955,13.62 r0 bottom
C4.L3 "0.1uF,50V (0805)" 0805 111.885,33.705 r90 top
C4.L4 "0.1uF,50V (0805)" 0805 14.37,4.62 r270 top
C4.L5 "0.1uF,50V (0805)" 0805 18.57,18.83 r270 bottom
C4.L6 "0.1uF,50V (0805)" 0805 14.99,51.82 r180 bottom
C4.L7 "0.1uF,50V (0603)" 0603#1 23.07,26.32 r270 bottom
C4.L9 "0.1uF,50V (0603)" 0603#1 72.08,43.03 r180 bottom
C5.L2 "0.1uF,50V (0603)" 0603#1 47.9,16.14 r270 bottom
C5.L3 "0.1uF,50V (0805)" 0805 102.705,30.62 r0 top
C5.L5 "0.1uF,50V (0805)" 0805 20.73,18.83 r270 bottom
C5.L7 "0.1uF,50V (0603)" 0603#1 18.79,35.85 r180 top
C5.L9 "0.1uF,50V (0603)" 0603#1 72.08,41.1 r180 bottom
C6.L2 "0.1uF,50V (0603)" 0603#1 49.77,16.14 r270 bottom
C6.L3 "0.1uF,50V (0805)" 0805 103.3,9.85 r90 top
C6.L5 "0.1uF,50V (0805)" 0805 21.62,15.74 r180 bottom
C6.L7 "0.1uF,50V (0603)" 0603#1 33.98,36.56 r0 bottom
C6.L9 "0.1uF,50V (0603)" 0603#1 84.095,30.06 r0 bottom
C7.L2 "47uF,6.3V (0603)" 0603#1 63.22,4.7 r270 bottom
C7.L3 "47uF,10V (B)" TAJB 102.575,45.845 r180 top
C7.L5 "0.1uF,50V (0805)" 0805 21.55,23.5 r0 bottom
C7.L7 "0.1uF,50V (0603)" 0603#1 23.35,40.16 r90 bottom
C7.L9 "0.1uF,50V (0603)" 0603#1 84.095,31.93 r0 bottom
C8.L2 "47uF,6.3V (0603)" 0603#1 61.345,4.712 r270 bottom
C8.L3 "22uF,10V (0805)" 0805 106.064,46.204 r90 top
C8.L5 "10uF,16V (0805)" 0805 9.68,38.29 r270 bottom
C8.L7 "0.1uF,50V (0603)" 0603#1 33.97,26.34 r0 bottom
C8.L9 "0.1uF,50V (0603)" 0603#1 84.095,28.2 r0 bottom
C9.L2 "0.1uF,50V (0603)" 0603#1 34.51,9.71 r90 top
C9.L3 "0.1uF,50V (0805)" 0805 108.189,46.204 r90 top
C9.L5 "10uF,16V (0805)" 0805 7.52,38.29 r270 bottom
C9.L7 "0.1uF,50V (0603)" 0603#1 18.79,38.808 r180 top
C9.L9 "0.1uF,50V (0603)" 0603#1 78.19,27.25 r270 bottom
C10.L2 "0.1uF,50V (0603)" 0603#1 41.431,9.71 r90 top
C10.L3 "0.1uF,50V (0805)" 0805 106.44,39.805 r0 top
C10.L5 "2.2uF,16V (0805)" 0805 14.49,25.55 r270 top
C10.L7 "0.1uF,50V (0603)" 0603#1 32.48,40.16 r90 bottom
C10.L9 "0.1uF,50V (0603)" 0603#1 84.095,39.4 r0 bottom
C11.L2 "0.1uF,50V (0603)" 0603#1 37.76,38.63 r270 top
C11.L3 "0.1uF,50V (0805)" 0805 110.545,27.29 r0 top
C11.L5 "10uF,16V (0805)" 0805 9.99,26.42 r180 top
C11.L7 "0.1uF,50V (0603)" 0603#1 23.069,30.17 r90 bottom
C11.L9 "0.1uF,50V (0603)" 0603#1 84.095,41.249 r0 bottom
C12.L2 "0.1uF,50V (0603)" 0603#1 59.021,40.432 r90 bottom
C12.L3 "0.1uF,50V (0805)" 0805 96.3,29.67 r270 top
C12.L5 "0.1uF,50V (0805)" 0805 14.46,29.5 r90 top
C12.L7 "0.1uF,50V (0603)" 0603#1 33.98,34.76 r0 bottom
C12.L9 "0.1uF,50V (0603)" 0603#1 75.67,45.44 r90 bottom
C13.L2 "0.1uF,50V (0603)" 0603#1 51.399,46.08 r0 bottom
C13.L3 "0.1uF,50V (0805)" 0805 101.97,3.405 r0 top
C13.L5 "12pF,50V (0603)" 0603#1 21.01,34.4 r90 bottom
C13.L7 "0.1uF,50V (0805)" 0805 33.59,16.74 r0 bottom
C13.L9 "0.1uF,50V (0805)" 0805 62.52,36.27 r90 bottom
C14.L2 "0.1uF,50V (0603)" 0603#1 51.399,44.229 r0 bottom
C14.L3 "0.1uF,50V (0805)" 0805 117.84,44.265 r90 top
C14.L5 "12pF,50V (0603)" 0603#1 18.19,34.4 r90 bottom
C14.L7 "0.1uF,50V (0603)" 0603#1 33.25,20.6 r0 bottom
C14.L9 "0.1uF,50V (0603)" 0603#1 66.425,35.914 r90 bottom
C15.L2 "10uF,10V (0603)" 0603#1 48.93,38.63 r90 top
C15.L3 "0.1uF,50V (0805)" 0805 111.83,15.81 r180 top
C15.L7 "0.1uF,50V (0603)" 0603#1 36.51,20.6 r0 bottom
C15.L9 "0.1uF,50V (0603)" 0603#1 66.425,39.204 r90 bottom
C16.L2 "0.1uF,50V (0603)" 0603#1 50.8,38.63 r90 top
C16.L3 "0.1uF,50V (0805)" 0805 106.57,22.265 r0 top
C16.L7 "0.1uF,50V (0603)" 0603#1 23.069,34.13 r90 bottom
C16.L9 "0.1uF,50V (0603)" 0603#1 84.095,35.67 r0 bottom
C17.L2 "0.1uF,50V (0603)" 0603#1 48.22,41.92 r270 bottom
C17.L3 "0.1uF,50V (0805)" 0805 116.02,4.39 r270 bottom
C17.L7 "0.1uF,50V (0603)" 0603#1 33.97,28.06 r0 bottom
C17.L9 "0.1uF,50V (0603)" 0603#1 78.05,40.48 r90 bottom
C18.L2 "10uF,10V (0603)" 0603#1 35.9,38.63 r270 top
C18.L3 "0.1uF,50V (0805)" 0805 111.305,49.125 r180 top
C19.L2 "47uF,6.3V (0603)" 0603#1 37.7,21.5 r180 top
C19.L3 "0.1uF,50V (0805)" 0805 114.205,23.5 r180 top
C20.L2 "47uF,6.3V (0603)" 0603#1 41.49,16.14 r270 top
C20.L3 "0.1uF,50V (0805)" 0805 106.57,20.125 r0 top
C21.L2 "0.1uF,50V (0603)" 0603#1 39.63,16.14 r270 top
C21.L3 "0.1uF,50V (0805)" 0805 113.04,4.38 r270 bottom
C22.L2 "0.1uF,50V (0603)" 0603#1 37.7,29.92 r180 top
C22.L3 "0.1uF,50V (0805)" 0805 115.275,49.125 r0 top
C23.L2 "0.1uF,50V (0603)" 0603#1 37.7,33.72 r180 top
C23.L3 "0.1uF,50V (0805)" 0805 111.83,17.975 r180 top
C24.L2 "0.1uF,50V (0603)" 0603#1 37.7,25.21 r180 top
C24.L3 "0.1uF,50V (0805)" 0805 106.57,17.975 r0 top
C25.L2 "47uF,6.3V (0603)" 0603#1 45.26,16.14 r90 top
C25.L3 "0.1uF,50V (0805)" 0805 113.04,4.4 r270 top
C26.L2 "47uF,6.3V (0603)" 0603#1 52.68,38.63 r90 top
C26.L3 "22uF,10V (B)" TAJB 111.465,37.99 r180 top
C27.L2 "0.1uF,50V (0603)" 0603#1 43.37,16.18 r270 bottom
C27.L3 "22uF,10V (B)" TAJB 111.47,20.75 r180 top
C28.L2 "0.1uF,50V (0603)" 0603#1 45.259,12.86 r270 top
C28.L3 "0.1uF,50V (0805)" 0805 102.505,17.975 r180 top
C29.L2 "0.1uF,50V (0603)" 0603#1 54.55,38.63 r90 top
C29.L3 "22uF,10V (B)" TAJB 116.57,4.88 r270 top
C30.L2 "0.1uF,50V (0603)" 0603#1 37.7,35.6 r180 top
C30.L3 "22uF,10V (B)" TAJB 116.52,37.99 r0 top
C31.L2 "0.1uF,50V (0603)" 0603#1 47.163,16.14 r90 top
C31.L3 "22uF,10V (B)" TAJB 116.375,20.75 r0 top
C32.L2 "0.1uF,50V (0603)" 0603#1 54.73,42.41 r270 top
C32.L3 "22uF,10V (B)" TAJB 101.675,15.145 r180 top
C33.L2 "47uF,6.3V (0603)" 0603#1 64.555,44.14 r270 bottom
C33.L3 "22uF,10V (B)" TAJB 116.59,9.96 r90 top
C34.L2 "47uF,6.3V (0603)" 0603#1 59.86,18.71 r0 top
C34.L3 "22uF,10V (B)" TAJB 106.68,15.145 r0 top
C35.L2 "47uF,6.3V (0603)" 0603#1 66.426,44.14 r270 bottom
C36.L2 "10uF,10V (0603)" 0603#1 59.876,20.57 r0 bottom
C37.L2 "0.1uF,50V (0603)" 0603#1 54.339,38.66 r90 bottom
C38.L2 "0.1uF,50V (0603)" 0603#1 59.876,18.71 r0 bottom
C39.L2 "0.1uF,50V (0603)" 0603#1 52.46,38.66 r90 bottom
C40.L2 "0.1uF,50V (0603)" 0603#1 55.732,16.14 r270 bottom
C41.L2 "0.1uF,50V (0603)" 0603#1 39.802,20.604 r180 bottom
C42.L2 "0.1uF,50V (0603)" 0603#1 39.802,18.75 r180 bottom
C43.L2 "47uF,6.3V (0603)" 0603#1 63.18,13.111 r0 bottom
C44.L2 "0.1uF,50V (0603)" 0603#1 49.24,16.14 r270 top
C45.L2 "0.1uF,50V (0603)" 0603#1 56.82,42.41 r270 top
C46.L2 "10uF,10V (0603)" 0603#1 63.18,14.98 r0 bottom
C47.L2 "0.1uF,50V (0603)" 0603#1 53.84,16.14 r270 bottom
C48.L2 "0.1uF,50V (0603)" 0603#1 63.18,16.84 r0 bottom
C49.L2 "0.1uF,50V (0603)" 0603#1 52.09,16.14 r270 bottom
C50.L2 "0.1uF,50V (0603)" 0603#1 63.18,18.71 r0 bottom
D1.L2 "XC7Z020-2CLG400I (CLG-400)" CLG-400 49.02,27.36 r0 top locked
D1.L3 "TPS563201DDC (SOT23-6)" SOT23-6 107.119,42.554 r90 top
D1.L4 "CH340E (MSOP-10)" MSOP-10 14.04,8.35 r0 top locked
D1.L5 "TPS2051BDBVR (SOT23-5)" SOT-23-5 4.54,38.27 r90 bottom
D1.L6 "TXS02612RTWR (QFN-24)" QFN-24 20.51,56.53 r90 top locked
D1.L7 "DDR3 (BGA-96-ZIF)" "VFBGA-96 (ZIF)" 28.02,31.265 r0 top locked
D1.L9 "ASS3145-BGA96-8X14-0.8(1.4)-SC" ASS3145-BGA96-8X14-0.8(1.4)-SC 78.08,36.245 r180 top locked
D2.L2 "SMD03225P4, DSC-8001CL5 (100MHz, 3.3V, 16pF, 3.3x2.5)" SMD03225 50.965,12.66 r180 bottom
D2.L3 "TPS563201DDC (SOT23-6)" SOT23-6 110.73,30.04 r90 top
D2.L5 "USB3320C-EZK (QFN-32)" QFN-32 15.5,23.7 r90 bottom locked
D3.L2 "W25Q128JVSIQ (VSOP-8)" VSOP-8 44.34,46.84 r0 bottom locked
D3.L3 "TPS563201DDC (SOT23-6)" SOT23-6 99.05,29.425 r0 top
D4.L2 "33.333 MHz SMD07050C4 (3,3В, MO-36B-S, T/CM)" "XO91050UITA (7x5mm)" 49.66,43.52 r180 top
D4.L3 "TPS563201DDC (SOT23-6)" SOT23-6 102.265,6.18 r90 top
K1.L8 "V23079A1001B301 TE" V23079A1001B301 85.52,4.97 r180 top
K2.L8 "V23079A1001B301 TE" V23079A1001B301 70.49,4.97 r180 top
KP1.L2 "L20P" Plosh15X06 76.613,24.176 r180 bottom
KP1.L5 "VDD33" Plosh15X06 12.68,26.065 r180 top
KP1.L7 "A15" Plosh15X06 30.02,28.679 r0 bottom
KP2.L2 "L20N" Plosh15X06 75.193,24.176 r180 bottom
KP3.L2 "L21P" Plosh15X06 73.177,22.305 r90 bottom
KP4.L2 "L21N" Plosh15X06 73.177,20.88 r90 bottom
KP5.L2 "L20P" Plosh15X06 70.431,22.305 r90 bottom
KP6.L2 "L20N" Plosh15X06 73.177,19.45 r90 bottom
KP7.L2 "L21P" Plosh15X06 70.431,19.435 r90 bottom
KP8.L2 "L21N" Plosh15X06 70.431,20.865 r90 bottom
KP9.L2 "MIO11" Plosh15X06 34.022,42.074 r180 bottom
L1.L2 "BLM21(0805) Murata" 0805 51.21,41.37 r0 bottom
L1.L3 "VLS6045EX-4R7M-H (4.7uH, 6A)" VLS6045EX-4R7M-H 112.935,44.795 r0 top value={Value}
L2.L2 "BLM21(0805) Murata" 0805 56.78,46.03 r270 top
L2.L3 "VLS6045EX-4R7M-H (4.7uH, 6A)" VLS6045EX-4R7M-H 116.115,28.56 r270 top value={Value}
L3.L3 "VLS6045EX-4R7M-H (4.7uH, 6A)" VLS6045EX-4R7M-H 101.24,23.545 r270 top value={Value}
L4.L3 "VLS6045EX-4R7M-H (4.7uH, 6A)" VLS6045EX-4R7M-H 108.13,7.405 r0 top value={Value}
R1.L1 "0 (0603)" 0603#1 55.74,16.14 r270 top
R1.L2 "100 (0603)" 0603#1 37.7,32.225 r0 bottom
R1.L3 "47 (0603)" 0603#1 106.81,24.535 r0 top
R1.L4 "5.1k (0603)" 0603#1 11.6,3.88 r0 top
R1.L5 "0 (0603)" 0603#1 18.119,16.95 r90 top
R1.L6 "4.7k (0603)" 0603#1 18.47,51.94 r90 top
R1.L7 "100 (0603)" 0603#1 33.25,23.932 r270 bottom
R1.L8 "0 (0603)" 0603#1 77.52,45.44 r270 bottom
R1.L9 "100 (0603)" 0603#1 69.605,33.074 r90 bottom
R2.L1 "0 (0603)" 0603#1 60.73,10.57 r180 top
R2.L2 "100 (0603)" 0603#2 38.5,29.835 r0 bottom
R2.L3 "47 (0603)" 0603#1 94.24,8.1 r90 top
R2.L4 "5.1k (0603)" 0603#1 11.61,5.73 r0 top
R2.L5 "0 (0603)" 0603#1 10.38,22.75 r90 top
R2.L6 "0 (0603)" 0603#1 22.63,51.27 r180 bottom
R2.L7 "4.7k (0603)" 0603#1 24.834,22.56 r90 bottom
R2.L8 "0 (0603)" 0603#1 79.38,45.44 r270 bottom
R2.L9 "4.7k (0603)" 0603#1 81.92,44.73 r180 bottom
R3.L2 "1k (0603)" 0603#1 93.87,47.3 r180 bottom
R3.L3 "10k (0603)" 0603#1 105.075,33.45 r90 top
R3.L4 "5.1k (0603)" 0603#1 4.22,8.6 r180 bottom
R3.L5 "0 (0603)" 0603#1 21.79,13.34 r0 bottom
R3.L6 "0 (0603)" 0603#1 17.91,48.07 r270 bottom
R3.L7 "240 (0603)" 0603#1 33.97,29.91 r180 bottom
R3.L8 "4.7k (0603)" 0603#1 93.68,15.81 r0 bottom
R3.L9 "240 (0603)" 0603#1 72.08,38.58 r0 bottom
R4.L2 "20k (0603)" 0603#1 95.21,49.26 r270 top
R4.L3 "10k (0603)" 0603#1 97.2,8.1 r90 top
R4.L4 "5.1k (0603)" 0603#1 4.22,10.45 r180 bottom
R4.L5 "10k (0603)" 0603#1 7.48,35.33 r0 bottom
R4.L6 "4.7k (0603)" 0603#1 15.025,53.83 r0 bottom
R4.L7 "1k (0603)" 0603#1 33.25,18.75 r180 bottom
R4.L8 "20k (0603)" 0603#1 93.68,13.97 r180 bottom
R4.L9 "1k (0603)" 0603#1 64.555,35.914 r270 bottom
R5.L2 "1k (0603)" 0603#1 93.87,45.2 r180 bottom
R5.L3 "1k (0603)" 0603#1 100.045,32.555 r180 top
R5.L4 "0 (0603)" 0603#1 19.27,5.605 r180 top
R5.L5 "33 (0603)" 0603#1 15.72,18.53 r0 bottom
R5.L6 "4.7k (0603)" 0603#1 20.85,61.35 r180 top
R5.L7 "1k (0603)" 0603#1 36.51,18.75 r180 bottom
R5.L8 "0 (0603)" 0603#1 84.095,37.54 r180 bottom
R5.L9 "1k (0603)" 0603#1 64.555,39.204 r270 bottom
R6.L2 "20k (0603)" 0603#1 95.21,45.962 r270 top
R6.L3 "10k (0603)" 0603#1 106.92,33.455 r90 top
R6.L4 "0 (0603)" 0603#1 15.38,16.22 r180 top
R6.L5 "7.5k (0603)" 0603#1 15.99,29.92 r90 bottom
R6.L6 "1 (0603)" 0603#1 15.025,55.69 r180 bottom
R6.L7 "0 (0603)" 0603#1 36.51,22.453 r180 bottom
R6.L8 "0 (0603)" 0603#1 84.095,33.788 r180 bottom
R7.L2 "0 (0603)" 0603#1 61.66,29.5 r0 bottom
R7.L3 "10k (0603)" 0603#1 99.095,8.1 r90 top
R7.L4 "0 (0603)" 0603#1 19.77,8.993 r0 top
R7.L5 "4.7k (0603)" 0603#1 18.31,20.71 r270 top
R7.L6 "100 (0603)" 0603#1 17.56,61.35 r180 top
R7.L8 "4.7k (0603)" 0603#1 75,15.81 r0 bottom
R8.L2 "0 (0603)" 0603#1 61.66,27.6 r0 bottom
R8.L3 "10k (0603)" 0603#1 103.964,42.574 r270 top
R8.L4 "0 (0603)" 0603#1 19.77,10.83 r0 top
R8.L5 "560 (0603)" 0603#1 15.99,33.15 r90 bottom
R8.L8 "20k (0603)" 0603#1 75,13.97 r180 bottom
R9.L2 "1k (0603)" 0603#1 93.87,35.83 r180 bottom
R9.L3 "47k (0603)" 0603#1 96.79,32.555 r180 top
R9.L4 "2k (0603)" 0603#1 6.36,19.12 r180 top
R9.L5 "1k (0603)" 0603#1 16.37,29.64 r90 top
R10.L2 "1k (0603)" 0603#1 93.87,33.95 r180 bottom
R10.L3 "33k (0603)" 0603#1 114.39,40.61 r0 top
R10.L4 "1.5k (0603)" 0603#1 6.36,15.41 r180 top
R10.L5 "1k (0603)" 0603#1 12.3,19.512 r270 top
R11.L2 "4.7k (0603)" 0603#1 54.955,11.721 r0 bottom
R11.L3 "100k (0603)" 0603#1 111.05,40.61 r0 top
R11.L4 "1.5k (0603)" 0603#1 6.36,17.265 r180 top
R11.L5 "10M (0603)" 0603#1 19.37,27.33 r180 bottom
R12.L2 "100 (0603)" 0603#1 46.03,16.14 r90 bottom
R12.L3 "100k (0603)" 0603#1 110.605,25.245 r0 top
R12.L5 "10k (0603)" 0603#1 18.231,29.64 r90 top
R13.L2 "1k (0603)" 0603#1 59.02,37.15 r270 bottom
R13.L3 "75k (0603)" 0603#1 110.62,23.38 r180 top
R13.L5 "10k (0603)" 0603#1 18.23,26.37 r270 top
R14.L2 "1k (0603)" 0603#1 57.159,38.66 r90 bottom
R14.L3 "75k (0603)" 0603#1 97.034,22.295 r270 top
R14.L5 "1.5k (0603)" 0603#1 6.36,22.85 r180 top
R15.L2 "10k (0603)" 0603#1 37.95,45.21 r0 top
R15.L3 "100k (0603)" 0603#1 97.034,25.536 r270 top
R15.L5 "10k (0603)" 0603#1 4.19,35.33 r0 bottom
R16.L2 "10k (0603)" 0603#1 39.63,38.63 r90 top
R16.L3 "33k (0603)" 0603#1 109.265,3.29 r0 top
R17.L2 "20k (0603)" 0603#1 93.86,37.63 r0 bottom
R17.L3 "10k (0603)" 0603#1 105.99,3.29 r0 top
R18.L2 "4.7k (0603)" 0603#1 93.87,39.44 r180 bottom
R18.L3 "0 (0805)" 0805 116.145,35.17 r180 top
R19.L2 "100 (0603)" 0603#1 47.06,38.63 r270 top
R19.L3 "0 (0805)" 0805 115.75,17.995 r180 top
R20.L2 "100 (0603)" 0603#1 41.49,38.63 r270 top
R20.L3 "0 (0805)" 0805 113.06,8.89 r270 top
R21.L2 "100 (0603)" 0603#1 43.35,38.63 r270 top
R21.L3 "0 (0805)" 0805 106.38,12.4 r180 top
R22.L2 "100 (0603)" 0603#1 45.19,38.63 r270 top
R22.L3 "1.5k (0603)" 0603#1 6.36,20.98 r180 top
R23.L2 "20k (0603)" 0603#1 45.97,38.66 r270 bottom
R24.L2 "20k (0603)" 0603#1 40.39,41.92 r270 bottom
R25.L2 "20k (0603)" 0603#1 42.25,38.66 r270 bottom
R26.L2 "20k (0603)" 0603#1 44.11,38.66 r270 bottom
R27.L2 "20k (0603)" 0603#1 42.25,41.92 r270 bottom
R28.L2 "20k (0603)" 0603#1 44.109,41.92 r270 bottom
R29.L2 "20k (0603)" 0603#1 40.39,38.66 r270 bottom
R30.L2 "4.7k (0603)" 0603#1 38.52,41.92 r90 bottom
R31.L2 "1k (0603)" 0603#1 52.99,16.14 r90 top
R32.L2 "1k (0603)" 0603#1 6.36,24.71 r180 top
R33.L2 "4.7k (0603)" 0603#1 54.73,45.7 r270 top
R34.L2 "0 (0603)" 0603#1 50.56,38.66 r270 bottom
R35.L2 "0 (0603)" 0603#1 48.22,38.66 r270 bottom
R36.L2 "560 (0603)" 0603#1 6.36,26.57 r180 top
R37.L2 "4.7k (0603)" 0603#1 37.7,27.06 r0 top
R38.L2 "4.7k (0603)" 0603#1 43.35,16.14 r90 top
R39.L2 "0 (0603)" 0603#1 37.7,23.37 r0 top
R40.L2 "1k (0603)" 0603#1 51.12,12.86 r270 top
R44.L2 "1k (0603)" 0603#1 93.87,43.2 r180 bottom
R45.L2 "20k (0603)" 0603#1 95.211,42.67 r90 top
R46.L2 "1k (0603)" 0603#1 93.87,41.26 r180 bottom
R47.L2 "20k (0603)" 0603#1 95.211,39.37 r90 top
SA1.L2 "KLS7-TS3401" KLS7-TS3401 37.83,48.13 r270 top
SA2.L2 "KLS7-TS3401" KLS7-TS3401 37.83,42.31 r90 top locked
SA3.L2 "SWITCH (DIP-03, DT-03, step 1.27)" "SWITCH (DIP-03, DT-03, step 1.27)" 43.33,44.8 r0 top
TNOW "TNOW" Plosh15X06 18.119,7.35 r90 top (schematic designator KP1.L4)
VD1.L2 "BAT60JFILM (SOD323)" SOD323 37.774,38.67 r270 bottom
VD1.L3 "MBRS360T3G (60V, 3A, SMB)" SMB(DO-214AA) 102.48,50.655 r270 top
VD1.L4 "BAT60JFILM (SOD323)" SOD323 11.38,10.57 r180 top
VD1.L5 "LED RED(0603)" 0603(LED) 3.08,22.85 r180 top
VD1.L8 "LL4148 NXP" SOD80C 89.68,5.58 r90 bottom
VD2.L2 "BAT60JFILM (SOD323)" SOD323 35.71,41.98 r270 bottom
VD2.L3 "LED RED(0603)" 0603(LED) 3.08,20.98 r180 top
VD2.L4 "LED GREEN (0603)" 0603(LED) 3.08,19.12 r180 top
VD2.L8 "LL4148 NXP" SOD80C 78.97,5.59 r90 bottom
VD3.L2 "LED GREEN (0603)" 0603(LED) 51.12,16.14 r270 top
VD3.L4 "LED RED(0603)" 0603(LED) 3.08,15.41 r180 top
VD4.L2 "LED GREEN (0603)" 0603(LED) 3.08,24.71 r180 top
VD4.L4 "LED RED (0603)" 0603(LED) 3.08,17.265 r180 top
VD5.L2 "LED GREEN (0603)" 0603(LED) 3.08,26.57 r180 top
VT1.L2 "MMBT5551L" SOT-23 90.68,41.62 r180 bottom
VT1.L3 "MMBT3904L*G ONS" SOT-23 106.81,27 r0 top
VT1.L8 "MMBT5551L" SOT-23 93.68,11.41 r0 bottom
VT2.L3 "MMBT3904L*G ONS" SOT-23 95.17,4.715 r270 top
VT2.L8 "MMBT5551L" SOT-23 74.99,11.41 r0 bottom
VT3.L3 "MMBT3904L*G ONS" SOT-23 106.81,30.2 r0 top
VT4.L3 "MMBT3904L*G ONS" SOT-23 98.385,4.715 r270 top
X1.L1 "PLS3-2" PLS3-2 36.965,11.9 r180 top
X1.L4 "MICRO-USB (USB3,1TYPE-C 16PF-26)" "MICRO-USB (USB3,1TYPE-C 16PF-26)" 5.51,8.07 r0 top locked
X1.L5 "USBA-1J (DS1095 B-R)" "USBA-1J (DS1095 B-R)" 10.705,35.745 r270 top locked
X1.L6 "MICRO-SD (9 pin)" "MICRO-SD (9 pin)" 9.055,54.71 r270 top locked
X2.L1 "PLS2-2" PLD2-2 14.95,13.09 r180 top locked
X3.L1 "PLS3-2" PLS3-2 38.965,11.9 r180 top
X4.L1 "BH2-14 (DS1014-14)" "BH2-14 (DS1014-14)" 46.98,53.93 r0 top locked
X5.L1 "PBD2-30 (DS-1026-06-2x15)" "PBD2-30 (DS1026-06-2x15)"#1 44.965,4.32 r180 top locked
X6.L1 "PLD6-2" PLD6-2 58.86,14.66 r270 top locked
X7.L1 "PBD2-30 (DS-1026-06-2x15)" "PBD2-30 (DS1026-06-2x15)"#2 44.965,62.2 r180 top locked
X8.L1 "PBD2-30 (DS-1026-06-2x15)" "PBD2-30 (DS1026-06-2x15)"#1 98.065,49.2 r270 top locked
X9.L1 "PLD6-2" PLD6-2 62.98,62.2 r0 top
X10.L1 "DS1073-01-2x2-MR1T6 (4 pin)" "DS1073-01-2x2-MR1T6 (4 pin)" 110.1,57.94 r0 top locked
X11.L1 "PLS2-2" PLD2-2 27.95,5.32 r270 top
ZQ1.L5 "DSX321G (24MHz, 3.2x2.5x0.7)" "DSX321G (3.2x2.5x0.7)" 19.49,30.73 r225 bottom

## Footprints (in the part's own frame and the unit in brackets; to place one, negate y for a bottom-side part, rotate by r counter-clockwise, add the part's x,y. Pads: shape width x height; smd on the part's side, far side on the other; paste and mask are expansions set on the pad)
0603#1 [mm]
  rect 0.9x1 smd: 1(-0.76,0) 2(0.76,0)
  silkscreen extent -1.53,-0.82 1.53,0.82
0603#2 [mm]
  rect 0.8x1 smd: 1(-0.898,0) 2(0.89,0)
  silkscreen extent -1.53,-0.82 1.53,0.82
0603(LED) [mm]
  rect 0.9x1 smd: 1(-0.76,0) 2(0.76,0)
  silkscreen extent -1.53,-0.82 1.53,0.82
0805 [mm]
  rect 1.2x1.3 smd: 1(-0.95,0) 2(0.95,0)
  silkscreen extent -1.87,-0.97 1.87,0.97
ASS3145-BGA96-8X14-0.8(1.4)-SC [mm]
  round 1.524 hole 2.3: 0(-13,14) 0(-13,-14) 0(13,14) 0(13,-14)
  round 1 hole 1.5: 0(-10.8,-7.5)
  round 1.524 hole 2: 0(10.8,7.5)
  round 0.42 smd mask+0.05: A1(-3.2,6) A2(-2.4,6) A3(-1.6,6) A7(1.6,6) A8(2.4,6) A9(3.2,6) B1(-3.2,5.2) B2(-2.4,5.2) B3(-1.6,5.2) B7(1.6,5.2) B8(2.4,5.2) B9(3.2,5.2) C1(-3.2,4.4) C2(-2.4,4.4) C3(-1.6,4.4) C7(1.6,4.4) C8(2.4,4.4) C9(3.2,4.4) D1(-3.2,3.6) D2(-2.4,3.6) D3(-1.6,3.6) D7(1.6,3.6) D8(2.4,3.6) D9(3.2,3.6) E1(-3.2,2.8) E2(-2.4,2.8) E3(-1.6,2.8) E7(1.6,2.8) E8(2.4,2.8) E9(3.2,2.8) F1(-3.2,2) F2(-2.4,2) F3(-1.6,2) F7(1.6,2) F8(2.4,2) F9(3.2,2) G1(-3.2,1.2) G2(-2.4,1.2) G3(-1.6,1.2) G7(1.6,1.2) G8(2.4,1.2) G9(3.2,1.2) H1(-3.2,0.4) H2(-2.4,0.4) H3(-1.6,0.4) H7(1.6,0.4) H8(2.4,0.4) H9(3.2,0.4) J1(-3.2,-0.4) J2(-2.4,-0.4) J3(-1.6,-0.4) J7(1.6,-0.4) J8(2.4,-0.4) J9(3.2,-0.4) K1(-3.2,-1.2) K2(-2.4,-1.2) K3(-1.6,-1.2) K7(1.6,-1.2) K8(2.4,-1.2) K9(3.2,-1.2) L1(-3.2,-2) L2(-2.4,-2) L3(-1.6,-2) L7(1.6,-2) L8(2.4,-2) L9(3.2,-2) M1(-3.2,-2.8) M2(-2.4,-2.8) M3(-1.6,-2.8) M7(1.6,-2.8) M8(2.4,-2.8) M9(3.2,-2.8) N1(-3.2,-3.6) N2(-2.4,-3.6) N3(-1.6,-3.6) N7(1.6,-3.6) N8(2.4,-3.6) N9(3.2,-3.6) P1(-3.2,-4.4) P2(-2.4,-4.4) P3(-1.6,-4.4) P7(1.6,-4.4) P8(2.4,-4.4) P9(3.2,-4.4) R1(-3.2,-5.2) R2(-2.4,-5.2) R3(-1.6,-5.2) R7(1.6,-5.2) R8(2.4,-5.2) R9(3.2,-5.2) T1(-3.2,-6) T2(-2.4,-6) T3(-1.6,-6) T7(1.6,-6) T8(2.4,-6) T9(3.2,-6)
  silkscreen extent -15.5,-29.5 15.5,22.5
"BH2-14 (DS1014-14)" [mm]
  round 1.2 hole 0.8: 1(-6,-1) 2(-6,1) 3(-4,-1) 4(-4,1) 5(-2,-1) 6(-2,1) 7(0,-1) 8(0,1) 9(2,-1) 10(2,1)
  oval 1.1x1.2 hole 0.8: 11(4,-1) 12(4,1) 13(6,-1) 14(6,1)
  silkscreen extent -10.75,-2.7 10.75,2.7